# Altium PCB PWM_Controller_Full_Bridge_TL494.PcbDoc (part 1 of 2)
Units mm, origin at the board's own origin, x right, y up, seen from the top; angles counter-clockwise.
Board outline 90 x 70 mm, 2 copper layers (Top Layer, Bottom Layer), stack 1.071 mm thick; 169 components, 72 nets, 398 pads, 71 vias.
Unrouted connection lines stored in the file: 17.
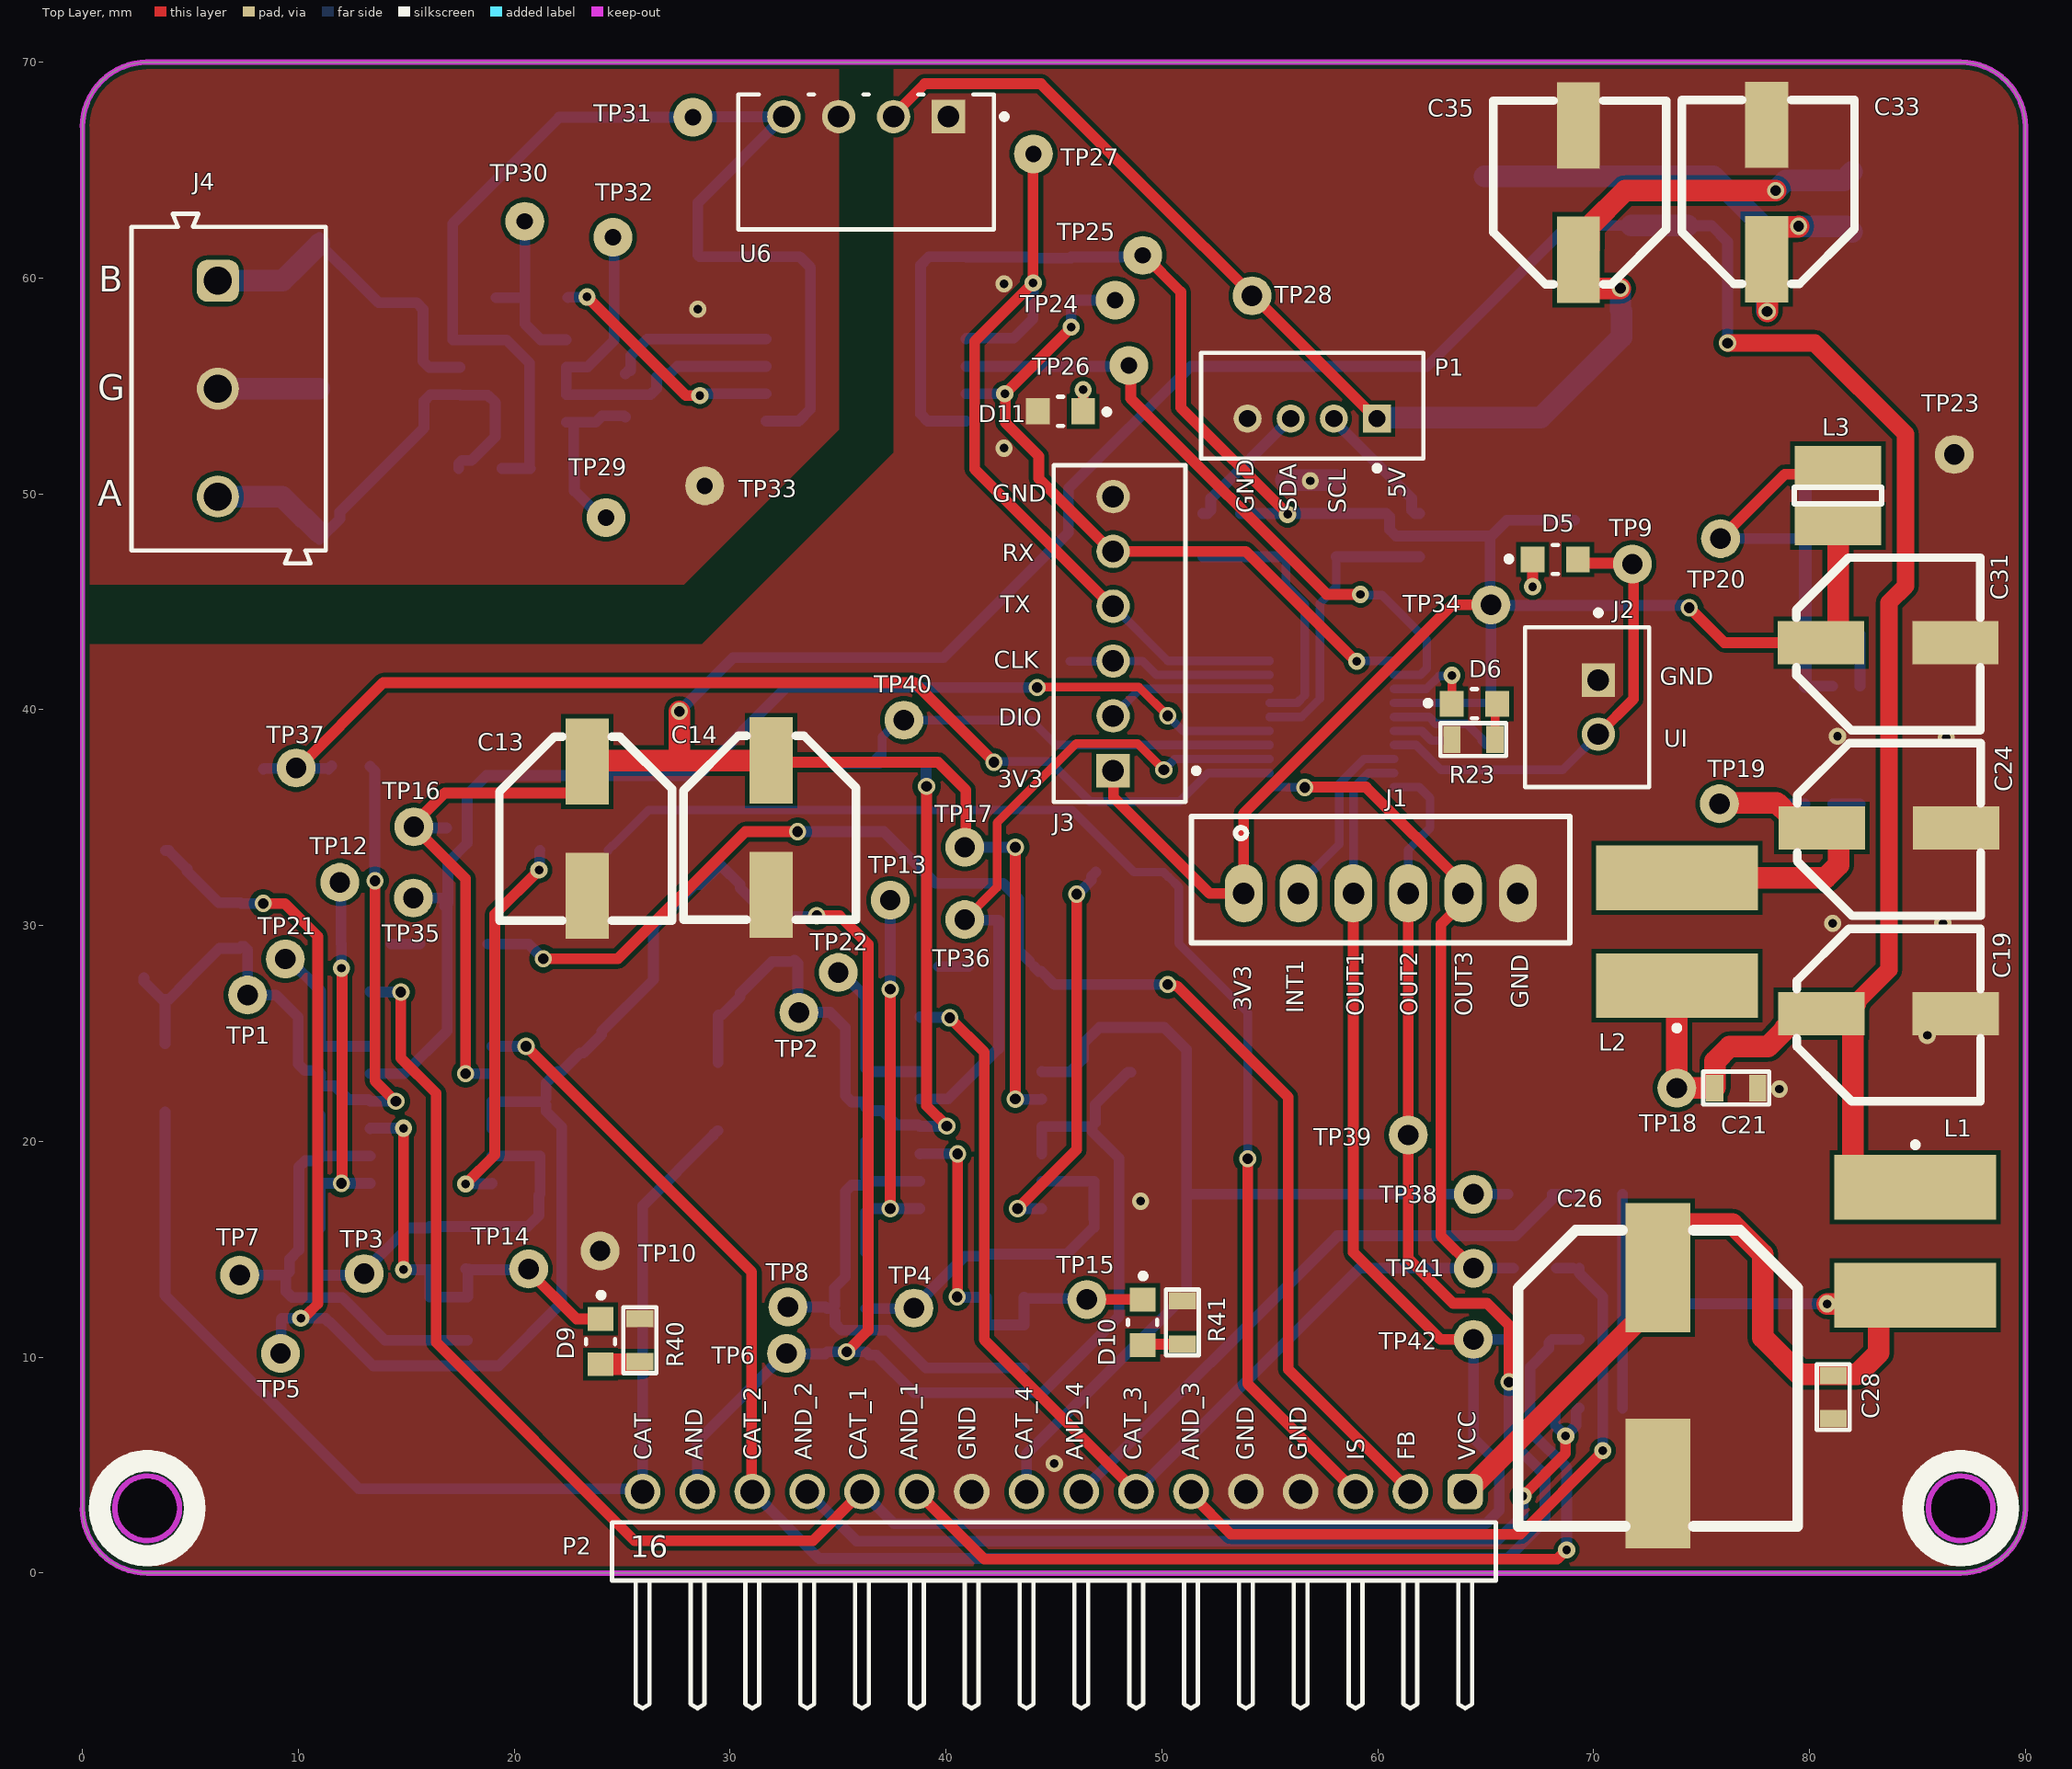
[diagram p0: Top Layer view]
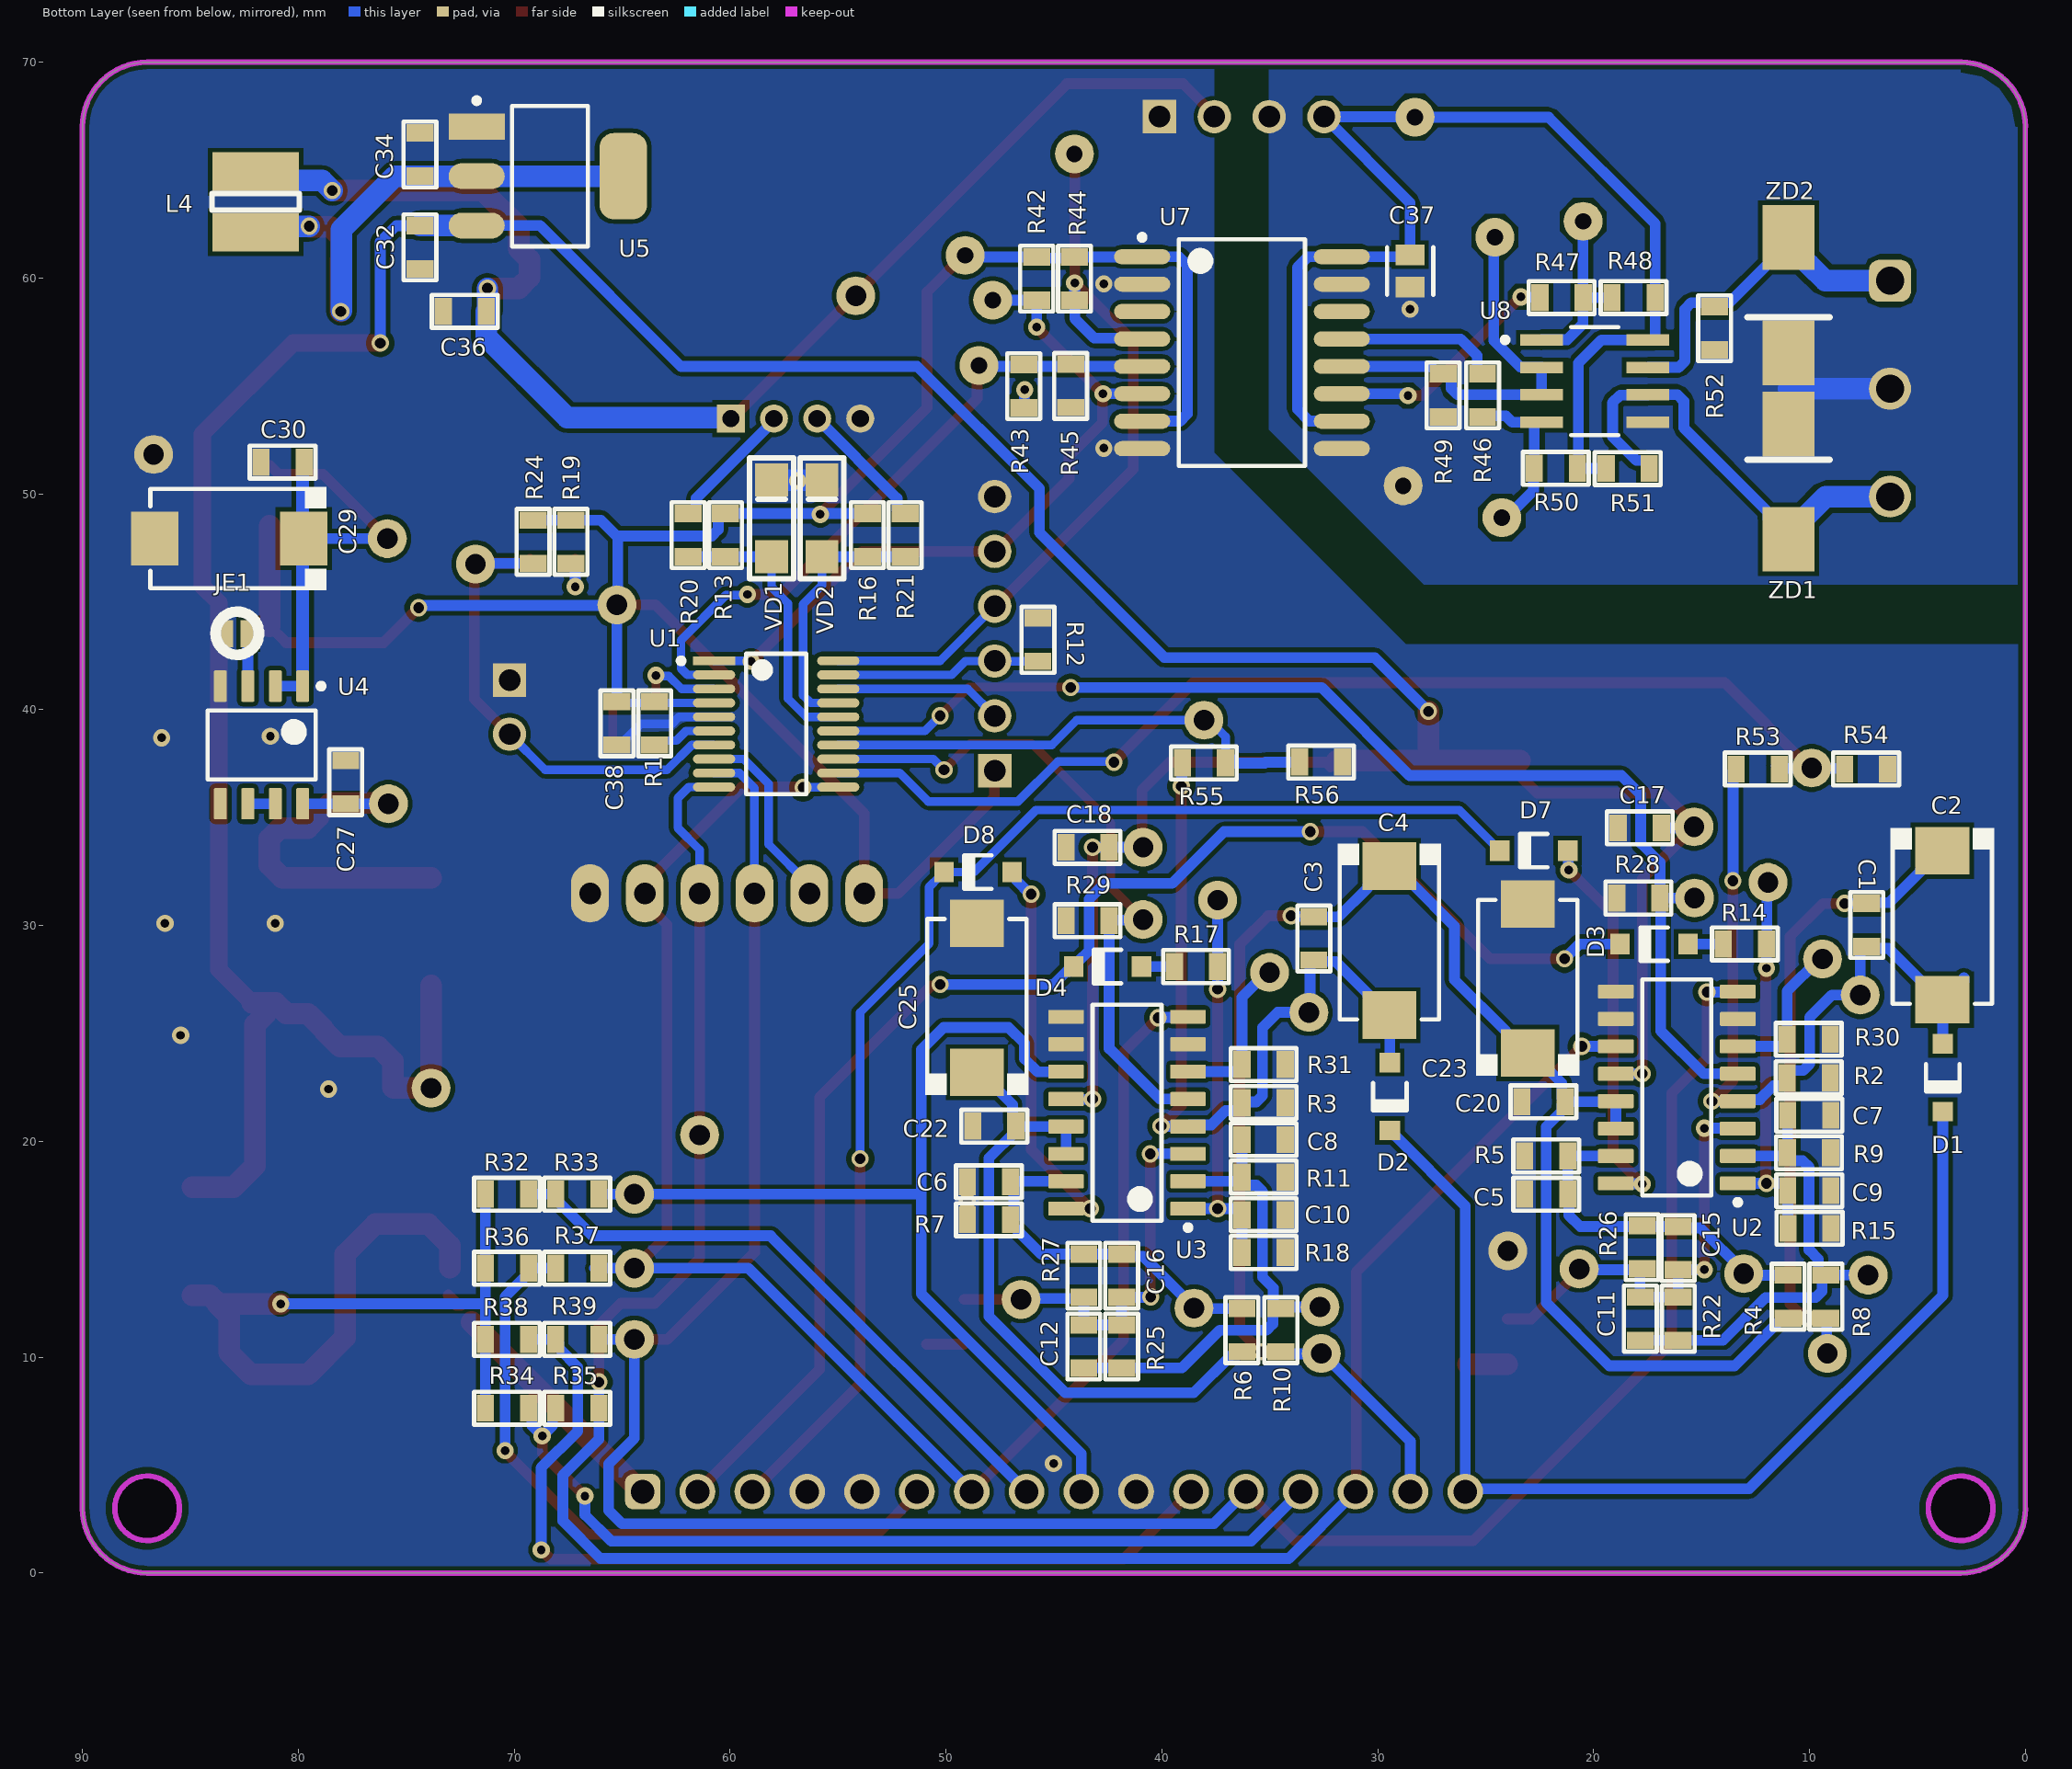
[diagram p1: Bottom Layer view, seen from below]
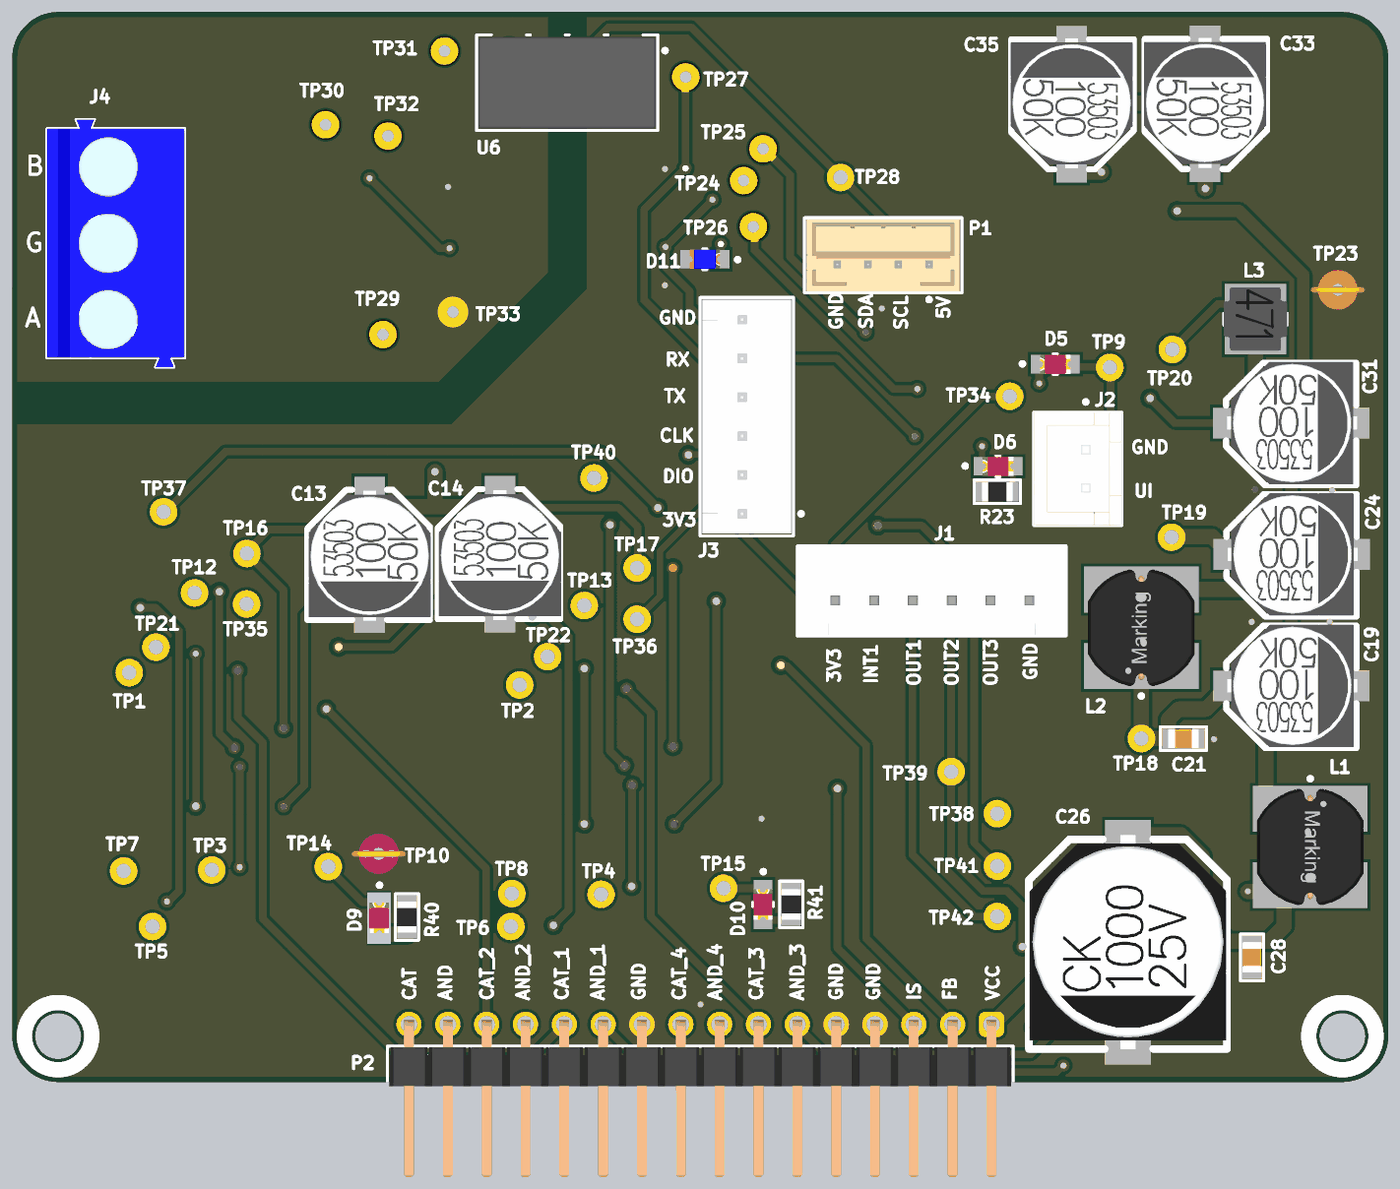
[diagram p2: 3D render of the assembled board from above, using the file's embedded part models]
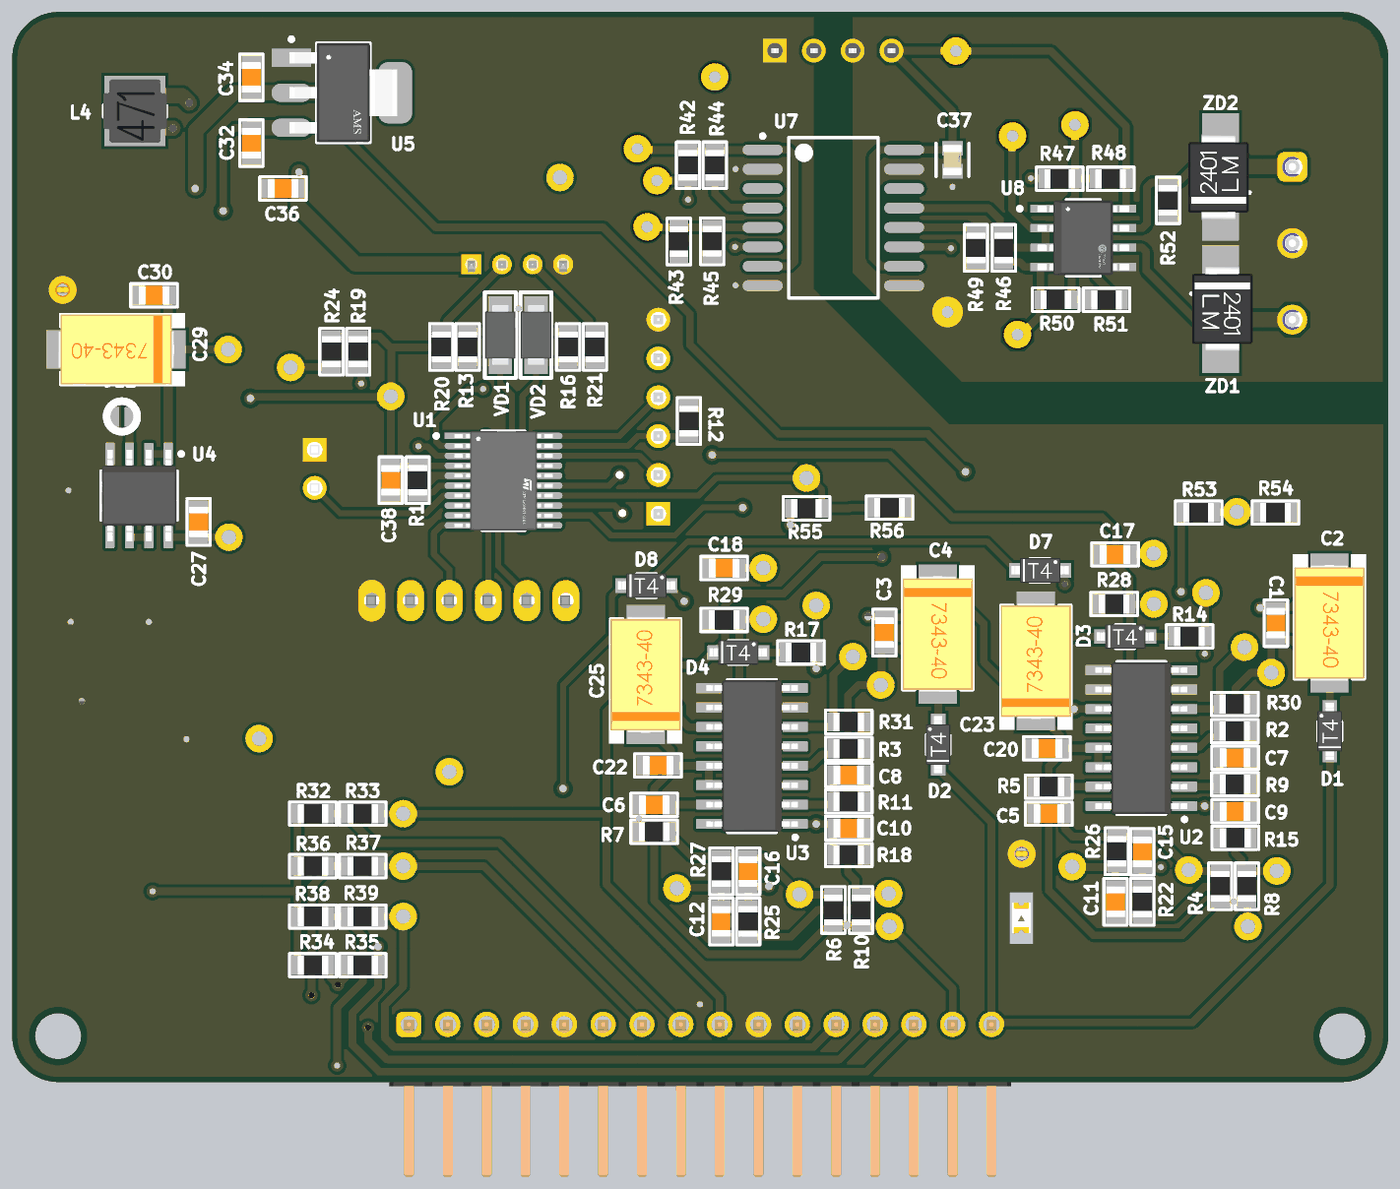
[diagram p3: 3D render of the assembled board from below, using the file's embedded part models]

## Layer stack, top to bottom
Top Solder: solder mask 0.0102, Solder Resist, Dk 3.5
Top Layer: signal copper 0.0356
Dielectric 1: dielectric 1, FR-4, Dk 4.8
Bottom Layer: signal copper 0.0356
Bottom Solder: solder mask 0.0102, Solder Resist, Dk 3.5

## Board outline
0,3 0.006,67 0,67 cw(c3,67) 3,70 87,70 cw(c87,67) 90,67 90,3.05 90,3 cw(c87,3) 87,0 2.999,0 3,0 cw(c3,3)
cut-out: 85.5,3 ccw(c87,3) 87,1.5 ccw(c87,3) 88.5,3 ccw(c87,3) 87,4.5 ccw(c87,3)
cut-out: 1.5,3 ccw(c3,3) 3,1.5 ccw(c3,3) 4.5,3 ccw(c3,3) 3,4.5 ccw(c3,3)

## Design rules (kind name [scope] priority, off if disabled: settings)
Clearance [All] p1: gap=0.2 ignorepadtopadclearanceinfootprint=FALSE except(0.4: Fill-Fill Fill-Poly Fill-Region Fill-Text Fill-Hole Poly-Poly Poly-Region Poly-Text Poly-Hole Region-Region Region-Text Region-Hole)
ComponentClearance [All] p1: gap=-3 collisioncheckmode=3 verticalgap=0.254 showdistances=FALSE
DiffPairsRouting [All] p1: maxlimit=0.254 minlimit=0.254 mostfreqgap=0.254 substack1={A23D90DD-733B-49C5-8102-56B3D284E3A0} toplayer_{a23d90dd-733b-49c5-8102-56b3d284e3a0}_minwidth=0.381 toplayer_{a23d90dd-733b-49c5-8102-56b3d284e3a0}_maxwidth=0.381 toplayer_{a23d90dd-733b-49c5-8102-56b3d284e3a0}_prefwidth=0.381 bottomlayer_{a23d90dd-733b-49c5-8102-56b3d284e3a0}_minwidth=0.381 bottomlayer_{a23d90dd-733b-49c5-8102-56b3d284e3a0}_maxwidth=0.381 bottomlayer_{a23d90dd-733b-49c5-8102-56b3d284e3a0}_prefwidth=0.381 toplayer_minwidth=0.381 toplayer_maxwidth=0.381 toplayer_prefwidth=0.381 bottomlayer_minwidth=0.381 bottomlayer_maxwidth=0.381 bottomlayer_prefwidth=0.381 substack2={0B3DB408-A969-412D-8C07-BA8AE97219D9} toplayer_{0b3db408-a969-412d-8c07-ba8ae97219d9}_minwidth=0.381 toplayer_{0b3db408-a969-412d-8c07-ba8ae97219d9}_maxwidth=0.381 toplayer_{0b3db408-a969-412d-8c07-ba8ae97219d9}_prefwidth=0.381 bottomlayer_{0b3db408-a969-412d-8c07-ba8ae97219d9}_minwidth=0.381 bottomlayer_{0b3db408-a969-412d-8c07-ba8ae97219d9}_maxwidth=0.381 bottomlayer_{0b3db408-a969-412d-8c07-ba8ae97219d9}_prefwidth=0.381 substack3={378827E6-B38F-4565-9D2F-710D8D441C30} toplayer_{378827e6-b38f-4565-9d2f-710d8d441c30}_minwidth=0.381 toplayer_{378827e6-b38f-4565-9d2f-710d8d441c30}_maxwidth=0.381 toplayer_{378827e6-b38f-4565-9d2f-710d8d441c30}_prefwidth=0.381 bottomlayer_{378827e6-b38f-4565-9d2f-710d8d441c30}_minwidth=0.381 bottomlayer_{378827e6-b38f-4565-9d2f-710d8d441c30}_maxwidth=0.381 bottomlayer_{378827e6-b38f-4565-9d2f-710d8d441c30}_prefwidth=0.381 substack4={1E65D4A7-266F-4925-B814-5E9C4A66F8EE} toplayer_{1e65d4a7-266f-4925-b814-5e9c4a66f8ee}_minwidth=0.381 toplayer_{1e65d4a7-266f-4925-b814-5e9c4a66f8ee}_maxwidth=0.381 toplayer_{1e65d4a7-266f-4925-b814-5e9c4a66f8ee}_prefwidth=0.381 bottomlayer_{1e65d4a7-266f-4925-b814-5e9c4a66f8ee}_minwidth=0.381 bottomlayer_{1e65d4a7-266f-4925-b814-5e9c4a66f8ee}_maxwidth=0.381 bottomlayer_{1e65d4a7-266f-4925-b814-5e9c4a66f8ee}_prefwidth=0.381 substack5={93C5D03E-862D-45F8-9871-970EEA9B3F11} toplayer_{93c5d03e-862d-45f8-9871-970eea9b3f11}_minwidth=0.381 toplayer_{93c5d03e-862d-45f8-9871-970eea9b3f11}_maxwidth=0.381 toplayer_{93c5d03e-862d-45f8-9871-970eea9b3f11}_prefwidth=0.381 bottomlayer_{93c5d03e-862d-45f8-9871-970eea9b3f11}_minwidth=0.381 bottomlayer_{93c5d03e-862d-45f8-9871-970eea9b3f11}_maxwidth=0.381 bottomlayer_{93c5d03e-862d-45f8-9871-970eea9b3f11}_prefwidth=0.381 maxuncoupledlength=12.7
Height [All] p1: minheight=0 maxheight=50 prefheight=33
HoleSize [All] p1: absolutevalues=TRUE maxlimit=6 minlimit=0.01 maxpercent=80.000 minpercent=20.000
HoleToHoleClearance [All] p1: gap=0.1 allowstackedmicrovias=TRUE
MinimumSolderMaskSliver [All] p1: minsoldermaskwidth=0.1
PlaneClearance [All] p1: clearance=0.7
PlaneConnect [All] p1: planeconnectstyle=Direct reliefexpansion=0.5 reliefentries=4 reliefconductorwidth=0.5 reliefairgap=0.15
PolygonConnect VQFN20 [HasFootprint('VQFN20')] p1: connectstyle=Direct reliefconductorwidth=0.254 reliefentries=4 polygonreliefangle="90 Angle" airgapwidth=0.254
PolygonConnect [All] p2: connectstyle=Direct reliefconductorwidth=0.3 reliefentries=4 polygonreliefangle="90 Angle" airgapwidth=0.15
RoutingVias [All] p1: holewidth=0.1 width=0.1 viastyle="Through Hole" minholewidth=0 minwidth=0.3 maxholewidth=2 maxwidth=4
ShortCircuit [All] p1: allowed=TRUE
SilkToSolderMaskClearance [IsPad] p1: minsilkscreentomaskgap=0.1 clearancetoexposedcopper=TRUE
SolderMaskExpansion SolderMaskExpansion_Via [IsVia] p1: expansion=0.102 istentingtop=TRUE useseparateexpansions=TRUE expansionbottom=0.102 istentingbottom=TRUE
SolderMaskExpansion [All] p2: expansion=0.01 istentingtop=FALSE
SupplyNets "Schematic Supply Nets_5" [InNet('GND_2')] p1: voltage=0.000
SupplyNets "Schematic Supply Nets_4" [InNet('+5V')] p2: voltage=0.000
SupplyNets "Schematic Supply Nets_3" [InNet('+12')] p3: voltage=0.000
SupplyNets "Schematic Supply Nets_2" [InNet('+5V_ISO')] p4: voltage=0.000
SupplyNets "Schematic Supply Nets_1" [InNet('GND')] p5: voltage=0.000
SupplyNets "Schematic Supply Nets" [InNet('+3v3')] p6: voltage=0.000
UnRoutedNet [All] p1: checkbadconnections=TRUE
Width [All] p1: maxlimit=5 minlimit=0.2 preferedwidth=0.3 substack1={A23D90DD-733B-49C5-8102-56B3D284E3A0} substack2={0B3DB408-A969-412D-8C07-BA8AE97219D9} substack3={378827E6-B38F-4565-9D2F-710D8D441C30} substack4={1E65D4A7-266F-4925-B814-5E9C4A66F8EE} substack5={93C5D03E-862D-45F8-9871-970EEA9B3F11}
19 further rules are at their usual default settings.

## Components (designator, comment, footprint, x,y, rotation, side; value= is the part's Value field where it differs from the comment)
C1 "CAP-NON-POLAR" CAP-0805 7.35,30.022 r90 bottom
C2 "CAP-POLAR" CAP-TAN-D 3.85,30.022 r270 bottom
C3 "CAP-NON-POLAR" CAP-0805 32.965,29.4 r90 bottom
C4 "CAP-POLAR" CAP-TAN-D 29.465,29.3 r270 bottom
C5 "CAP-NON-POLAR" CAP-0805 22.2,17.553 r180 bottom
C6 "CAP-NON-POLAR" CAP-0805 48.015,18.128 r180 bottom
C7 "CAP-NON-POLAR" CAP-0805 10.013,21.21 r0 bottom
C8 "CAP-NON-POLAR" CAP-0805 35.29,20.08 r0 bottom
C9 "CAP-NON-POLAR" CAP-0805 10.013,17.716 r0 bottom
C10 "CAP-NON-POLAR" CAP-0805 35.29,16.604 r0 bottom
C11 "2.2nF 16V" CAP-0805 17.837,11.787 r270 bottom
C12 "2.2nF 16V" CAP-0805 43.615,10.5 r270 bottom
C13 "CAP-POLAR" CAP_SMD_Size_E 23.375,34.425 r90 top
C14 "CAP-POLAR" CAP_SMD_Size_E 31.9,34.47 r90 top
C15 "2.2nF 16V" CAP-0805 16.09,15.055 r90 bottom
C16 "2.2nF 16V" CAP-0805 41.865,13.775 r90 bottom
C17 "0.1uF" CAP-0805 17.867,34.522 r180 bottom
C18 "0.1uF" CAP-0805 43.44,33.625 r180 bottom
C19 "CAP-POLAR" CAP_SMD_Size_E 83.727,25.916 r180 top
C20 "0.1uF" CAP-0805 22.325,21.835 r180 bottom
C21 "0.1uF" CAP-0805 76.602,22.466 r180 top
C22 "0.1uF" CAP-0805 47.763,20.705 r180 bottom
C23 "CAP-POLAR" CAP-TAN-D 23.05,27.542 r90 bottom
C24 "CAP-POLAR" CAP_SMD_Size_E 83.741,34.516 r180 top
C25 "CAP-POLAR" CAP-TAN-D 48.565,26.65 r90 bottom
C26 "25V_1000uF" CAP_SMD_SIZE_H 72.975,9.15 r90 top
C27 "0.1uF" CAP-0805 77.802,36.641 r270 bottom
C28 "0.1uF" CAP-0805 81.1,8.15 r90 top
C29 "CAP-POLAR" CAP-TAN-D 83.202,47.926 r0 bottom
C30 "0.1uF" CAP-0805 80.727,51.466 r180 bottom
C31 "CAP-POLAR" CAP_SMD_Size_E 83.71,43.109 r180 top
C32 "0.1uF" CAP-0805 74.366,61.425 r90 bottom
C33 "CAP-POLAR" CAP_SMD_Size_E 78.016,64.05 r270 top
C34 "0.1uF" CAP-0805 74.366,65.725 r270 bottom
C35 "CAP-POLAR" CAP_SMD_Size_E 69.291,64.025 r270 top
C36 "0.1uF" CAP-0805 72.291,58.455 r180 bottom
C37 "C0805C224K5RACTU" FP-C0805C-DN-MFG 28.5,60.325 r270 bottom value="0.22 μF"
C38 "0.1uF" CAP-0805 65.242,39.369 r90 bottom
D1 "1N4148" DIOD-SOD123-2_V 3.825,22.947 r270 bottom
D2 "1N4148" DIOD-SOD123-2_V 29.44,22.075 r270 bottom
D3 "1N4148" DIOD-SOD123-2_V 17.202,29.139 r0 bottom
D4 "1N4148" DIOD-SOD123-2_V 42.515,28.1 r0 bottom
D5 "151031YS06000" LED_RED 68.224,46.957 r0 top
D6 "151031YS06000" LED_RED 64.48,40.278 r0 top
D7 "1N4148" DIOD-SOD123-2_V 22.775,33.472 r0 bottom
D8 "1N4148" DIOD-SOD123-2_V 48.515,32.475 r0 bottom
D9 "RED" LED_RED 24,10.725 r270 top
D10 "RED" LED_RED 49.104,11.614 r270 top
D11 "LED" LED_BLUE 45.3,53.825 r180 top
J1 "B6B-XH-TW" B6B-XH-TW 60.14,32.124 r0 top
J2 "B2B-XH-A" B2B-XH-A 69.692,40.116 r270 top
J3 "SWR25X-NRTC-S06-ST-BA" Sullins_SWR25X-NRTC-S06-ST-BA_MFG 48.042,43.524 r90 top
J4 "" 691101710003 6.775,54.875 r270 top
JE1 "Jumper" JE 82.827,43.541 r270 bottom
L1 "47µH, 1.17A" WE-PD2_7850 84.9,15.375 r270 top
L2 "1000µH, 0.3A" WE-PD2_7850 73.852,29.716 r90 top
L3 "Coil" Coil_4.5x4.5_mm 81.316,49.916 r270 top
L4 "Coil" Coil_4.5x4.5_mm 81.975,63.525 r90 bottom
P1 "62000411622" 62000411622 56.967,54.089 r0 top
P2 "61301611021" 61301611021 45,1 r0 top locked
R1 "10K" RES-0805 63.492,39.369 r270 bottom
R2 "10K" RES-0805 10.036,22.947 r180 bottom
R3 "10K" RES-0805 35.29,21.8 r180 bottom
R4 "2K**" RES-0805 10.993,12.805 r90 bottom
R5 "2K" RES-0805 22.2,19.323 r0 bottom
R6 "2K**" RES-0805 36.29,11.25 r90 bottom
R7 "2K" RES-0805 48.015,16.372 r0 bottom
R8 "10K**" RES-0805 9.243,12.805 r90 bottom
R9 "2K" RES-0805 10.025,19.472 r180 bottom
R10 "10K**" RES-0805 34.49,11.25 r90 bottom
R11 "2K" RES-0805 35.29,18.35 r180 bottom
R12 "10K" RES-0805 45.742,43.239 r90 bottom
R13 "10K" RES-0805 60.213,48.089 r90 bottom
R14 "2K" RES-0805 13,29.148 r180 bottom
R15 "2K" RES-0805 10,15.972 r180 bottom
R16 "10K" RES-0805 53.642,48.089 r90 bottom
R17 "2K" RES-0805 38.415,28.1 r180 bottom
R18 "2K" RES-0805 35.29,14.85 r180 bottom
R19 "220" RES-0805 67.374,47.782 r90 bottom
R20 "10E" RES-0805 61.942,48.089 r90 bottom
R21 "10E" RES-0805 51.892,48.089 r90 bottom
R22 "1M" RES-0805 16.084,11.787 r90 bottom
R23 "220" RES-0805 64.43,38.614 r180 top
R24 "10K" RES-0805 69.124,47.782 r270 bottom
R25 "1M" RES-0805 41.865,10.5 r90 bottom
R26 "1M" RES-0805 17.75,15.097 r270 bottom
R27 "1M" RES-0805 43.615,13.775 r270 bottom
R28 "10K" RES-0805 17.928,31.272 r0 bottom
R29 "10K" RES-0805 43.44,30.225 r0 bottom
R30 "10K" RES-0805 10.036,24.727 r180 bottom
R31 "10K" RES-0805 35.29,23.555 r180 bottom
R32 "3K" RES-0805 70.335,17.551 r0 bottom
R33 "1K" RES-0805 67.08,17.551 r0 bottom
R34 "3K" RES-0805 70.335,7.64 r0 bottom
R35 "1K" RES-0805 67.08,7.64 r0 bottom
R36 "3K" RES-0805 70.335,14.121 r0 bottom
R37 "1K" RES-0805 67.08,14.121 r0 bottom
R38 "3K" RES-0805 70.335,10.826 r0 bottom
R39 "1K" RES-0805 67.08,10.826 r0 bottom
R40 "330" RES-0805 25.82,10.788 r270 top
R41 "330" RES-0805 50.95,11.614 r270 top
R42 "10K" RES-0805 45.8,59.975 r90 bottom
R43 "220" RES-0805 46.4,54.986 r90 bottom
R44 "10K" RES-0805 44.05,59.975 r90 bottom
R45 "10K" RES-0805 44.225,55 r90 bottom
R46 "100" RES-0805 25.148,54.564 r90 bottom
R47 "100" RES-0805 21.49,59.093 r0 bottom
R48 "10K" RES-0805 18.15,59.093 r180 bottom
R49 "10K" RES-0805 26.975,54.564 r90 bottom
R50 "10K" RES-0805 21.75,51.181 r180 bottom
R51 "10K" RES-0805 18.425,51.175 r0 bottom
R52 "10K" RES-0805 14.4,57.675 r90 bottom
R53 "4.7K" RES-0805 12.4,37.25 r0 bottom
R54 "1K" RES-0805 7.379,37.25 r0 bottom
R55 "4.7K" RES-0805 38.051,37.528 r0 bottom
R56 "1K" RES-0805 32.622,37.57 r0 bottom
TP1 "" Test_Point#1 7.65,26.781 r90 top
TP2 "" Test_Point#1 33.19,25.975 r90 top
TP3 "" Test_Point#1 13.05,13.871 r90 top
TP4 "" Test_Point#1 38.515,12.275 r90 top
TP5 "" Test_Point#1 9.175,10.172 r90 top
TP6 "" Test_Point#1 32.615,10.172 r90 top
TP7 "" Test_Point#1 7.286,13.805 r90 top
TP8 "" Test_Point#1 32.677,12.325 r90 top
TP9 "Test_Point_PCB" Test_Point#1 71.792,46.748 r0 top
TP10 "Test_Point_PCB" Pin_Test_Point(Pink) 23.975,14.925 r90 top
TP12 "" Test_Point#1 11.925,32 r90 top
TP13 "" Test_Point#1 37.415,31.175 r180 top
TP14 "" Test_Point#1 20.67,14.088 r90 top
TP15 "" Test_Point#1 46.525,12.674 r180 top
TP16 "" Test_Point#1 15.349,34.575 r90 top
TP17 "" Test_Point#1 40.872,33.625 r180 top
TP18 "Test_Point_PCB" Test_Point#1 73.852,22.466 r180 top
TP19 "Test_Point_PCB" Test_Point#1 75.827,35.641 r180 top
TP20 "Test_Point_PCB" Test_Point#1 75.877,47.926 r180 top
TP21 "" Test_Point#1 9.4,28.447 r90 top
TP22 "" Test_Point#1 35.015,27.825 r180 top
TP23 "Test_Point_PCB" Pin_Test_Point(Orange) 86.7,51.825 r90 top
TP24 "Test_Point_PCB" Test_Point#2 47.839,58.975 r90 top
TP25 "" Test_Point#2 49.111,61.05 r90 top
TP26 "Test_Point_PCB" Test_Point#2 48.475,55.95 r90 top
TP27 "Test_Point_PCB" Test_Point#2 44.05,65.75 r90 top
TP28 "Test_Point_PCB" Test_Point#1 54.175,59.175 r90 top
TP29 "Test_Point_PCB" Test_Point#2 24.25,48.9 r90 top
TP30 "" Test_Point#2 20.49,62.625 r90 top
TP31 "Test_Point_PCB" Test_Point#2 28.275,67.45 r90 top
TP32 "Test_Point_PCB" Test_Point#2 24.575,61.886 r90 top
TP33 "Test_Point_PCB" Test_Point#2 28.825,50.375 r90 top
TP34 "" Test_Point#1 65.242,44.857 r90 top
TP35 "Test_Point_PCB" Test_Point#1 15.328,31.272 r180 top
TP36 "Test_Point_PCB" Test_Point#1 40.872,30.275 r180 top
TP37 "Test_Point_PCB" Test_Point#1 9.9,37.3 r0 top
TP38 "Test_Point_PCB" Test_Point#3 64.58,17.551 r0 top
TP39 "Test_Point_PCB" Test_Point#4 61.56,19.996 r0 top
TP40 "Test_Point_PCB" Test_Point#1 38.051,39.516 r0 top
TP41 "Test_Point_PCB" Test_Point#3 64.58,14.121 r0 top
TP42 "Test_Point_PCB" Test_Point#3 64.58,10.826 r0 top
U1 "STM32G030F6P6" FP-TSSOP20-YA-IPC_A 57.867,39.339 r180 bottom
U2 "TL494" SOIC-16-M 16.15,22.497 r0 bottom
U3 "TL494" SOIC-16-M 41.615,21.325 r0 bottom
U4 "LP2951ACM-3.3" D0008A_N 81.702,38.366 r270 bottom
U5 "AMS1117" SOT-223 68.345,64.719 r270 bottom
U6 "B0505S-1W" B0505S-1W 36.3,65.375 r180 top
U7 "ADUM1401BRWZ" ADI-RW-16_M 36.292,56.541 r180 bottom
U8 "MAX485" SOIC-8-MFG 19.95,55.225 r180 bottom
VD1 "SMF3.3A" SMF3.3A 58.079,48.864 r180 bottom
VD2 "SMF3.3A" SMF3.3A 55.742,48.864 r180 bottom
ZD1 "P6SMB16CA" DO-214AA 10.975,52.85 r270 bottom
ZD2 "P6SMB16CA" DO-214AA 10.975,56.922 r90 bottom

## Footprints (in the part's own frame and the unit in brackets; to place one, negate y for a bottom-side part, rotate by r counter-clockwise, add the part's x,y. Pads: shape width x height; smd on the part's side, far side on the other; paste and mask are expansions set on the pad)
61301611021 [mm] "Pin Header, pitch 2.54 mm, THT, Angled, single row, 16p"
  rrect50% 1.65x1.65 hole 1.1: 1(19.05,2.77)
  round 1.65 hole 1.1: 2(16.51,2.77) 3(13.97,2.77) 4(11.43,2.77) 5(8.89,2.77) 6(6.35,2.77) 7(3.81,2.77) 8(1.27,2.77) 9(-1.27,2.77) 10(-3.81,2.77) 11(-6.35,2.77) 12(-8.89,2.77) 13(-11.43,2.77) 14(-13.97,2.77) 15(-16.51,2.77) 16(-19.05,2.77)
  silkscreen extent -20.47,-7.27 20.47,1.35, body extent -20.32,-7.27 20.32,3.09, height 2.58
62000411622 [mm] "2.00mm Male Vertical Shrouded Header, 4p"
  rect 1.3x1.3 hole 0.8: 1(3,-0.6)
  round 1.3 hole 0.8: 2(1,-0.6) 3(-1,-0.6) 4(-3,-0.6)
  silkscreen extent -5.15,-3.02 5.15,2.45, body extent -5,-2.35 5,2.35, height 6.13
691101710003 [mm] "5,00mm - modular - blue - Horizontal entry with pressure clamp - 12,6mm height - 03p"
  rrect50% 1.95x1.95 hole 1.3: 1(-5,-0.5)
  round 1.95 hole 1.3: 2(0,-0.5) 3(5,-0.5)
  silkscreen extent -8.1,-4.5 8.1,4.5, body extent -8.1,-4.5 8.1,4.5, height 12.65
ADI-RW-16_M [mm] "SOIC, 16-Leads, Body 10.3x7.5mm, Pitch 1.27mm, IPC Low Density"
  oval 2.6x0.7 smd: 1(-4.625,4.445) 2(-4.625,3.175) 3(-4.625,1.905) 4(-4.625,0.635) 5(-4.625,-0.635) 6(-4.625,-1.905) 7(-4.625,-3.175) 8(-4.625,-4.445) 9(4.625,-4.445) 10(4.625,-3.175) 11(4.625,-1.905) 12(4.625,-0.635) 13(4.625,0.635) 14(4.625,1.905) 15(4.625,3.175) 16(4.625,4.445)
  silkscreen extent -4.75,-5.25 2.93,5.47, body extent -3.8,-5.25 3.8,5.25, height 2.65
B2B-XH-A [mm]
  rect 1.55x1.55 hole 1 paste-2539.97 mask+0: 1(-1.25,0.525)
  round 1.55 hole 1 paste-2539.97 mask+0: 2(1.25,0.525)
  silkscreen extent -4.5,-2.88 3.7,2.88, body extent -3.8,-2.98 3.8,2.98, height 0.25
B6B-XH-TW [mm]
  oval 1.75x2.7 hole 1: 1(-6.35,-0.635) 2(-3.81,-0.635) 3(-1.27,-0.635) 4(1.27,-0.635) 5(3.81,-0.635) 6(6.35,-0.635)
  silkscreen extent -8.76,-2.92 8.76,2.92, body extent -8.75,-2.88 8.75,2.88, height 6.88
B0505S-1W [mm]
  rect 1.55x1.55 hole 1 paste-2539.97 mask+0: 1(-3.81,-2.1)
  round 1.55 hole 1 paste-2539.97 mask+0: 2(-1.27,-2.1) 3(1.27,-2.1) 4(3.81,-2.1)
  silkscreen extent -6.53,-3.13 5.92,3.13, body extent -6.02,-3.22 6.02,3.22, height 0.25
CAP-0805 [mm]
  rect 0.8x1.25 smd mask+0.015: 1(-1,0) 2(1,0)
  silkscreen extent -1.52,-0.76 1.52,0.76, body extent -1,-0.62 1,0.63, height 0.8
CAP-TAN-D [mm]
  rect 2.2x2.5 smd: 1(-3.45,0) 2(3.45,0)
  silkscreen extent -4.5,-2.4 3.65,2.4, body extent -3.8,-2.3 3.8,2.3, height 4
CAP_SMD_Size_E [mm]
  rect 4x2 smd: 1(3.175,0) 2(-3.048,0)
  silkscreen extent -4.19,-3.94 4.32,4.06, body extent -4.25,-4 4.25,4, height 10.59
CAP_SMD_SIZE_H [mm]
  rect 6x3 smd: 1(5,0) 2(-5,0)
  silkscreen extent -6.98,-6.48 6.73,6.48, body extent -7,-6.44 7,6.44, height 13.62
Coil_4.5x4.5_mm [mm]
  rect 1.8x4 smd: 1(-1.397,0) 2(1.397,0)
  silkscreen extent -0.38,-2.03 0.38,2.03, body extent -2.07,-2.07 2.07,2.07, height 2.8
D0008A_N [mm] "SOIC, 8-Leads, Body 5x4mm, Pitch 1.27mm, IPC Medium Density"
  rrect17% 1.45x0.6 smd: 1(-2.725,1.905) 2(-2.725,0.635) 3(-2.725,-0.635) 4(-2.725,-1.905) 5(2.725,-1.905) 6(2.725,-0.635) 7(2.725,0.635) 8(2.725,1.905)
  silkscreen extent -2.85,-2.5 1.6,2.88, body extent -3,-2.45 3,2.45, height 1.63
DIOD-SOD123-2_V [mm] "SOD123, 2-Leads, Body 2.7x1.55mm, Height 1.45mm"
  rect 0.9x0.95 smd: 1(1.575,0) 2(-1.575,0)
  silkscreen extent -0.64,-0.83 0.64,0.77, body extent -1.88,-0.8 1.88,0.8, height 1.3
DO-214AA [mm]
  rect 3x2.4 smd: 1(-0.381,0) 2(4.953,0)
  silkscreen extent 1.27,-1.91 1.27,1.9, body extent -0.53,-1.85 5.07,2.1, height 2.65
FP-C0805C-DN-MFG [mm]
  rect 0.95x1.35 smd paste+0 mask+0: 1(-0.75,0) 2(0.75,0)
  silkscreen extent -1.1,-1.07 1.1,1.07, body extent -1,-0.63 1,0.63, height 0.88
FP-TSSOP20-YA-IPC_A [mm]
  rect 1.955x0.421 smd paste+0 mask+0: 1(-2.875,2.925)
  rrect100% 1.955x0.421 smd paste+0 mask+0: 2(-2.875,2.275) 3(-2.875,1.625) 4(-2.875,0.975) 5(-2.875,0.325) 6(-2.875,-0.325) 7(-2.875,-0.975) 8(-2.875,-1.625) 9(-2.875,-2.275) 10(-2.875,-2.925) 11(2.875,-2.925) 12(2.875,-2.275) 13(2.875,-1.625) 14(2.875,-0.975) 15(2.875,-0.325) 16(2.875,0.325) 17(2.875,0.975) 18(2.875,1.625) 19(2.875,2.275) 20(2.875,2.925)
  silkscreen extent -4.53,-3.25 1.4,3.25, body extent -3.21,-3.25 3.21,3.25, height 1.2
JE [mil]
  rect 50x27.56 smd: 1(1,20) 2(1,-21)
  silkscreen extent -39,-39 39,39
LED_BLUE [mm]
  rect 1.1x1.2 smd paste+0 mask+0: 1(-1.05,0) 2(1.05,0)
  silkscreen extent -2.28,-0.67 0.13,0.67, body extent -1,-0.63 1,0.63, height 0.8
LED_RED [mm]
  rect 1.1x1.2 smd paste+0 mask+0: 1(-1.05,0) 2(1.05,0)
  silkscreen extent -2.27,-0.67 0.13,0.67, body extent -1.7,-0.77 1.7,0.77, height 0.25
Pin_Test_Point(Orange) [mm]
  round 1.8 hole 0.95: 1(0,0)
  body extent -1.3,-1.78 1.3,1.78, height 6.93
Pin_Test_Point(Pink) [mm]
  round 1.8 hole 0.95: 1(0,0)
  body extent -1.3,-1.78 1.3,1.78, height 6.93
RES-0805 [mm]
  rect 0.8x1.25 smd mask+0.015: 1(-1,0) 2(1,0)
  silkscreen extent -1.52,-0.76 1.52,0.76, body extent -1,-0.62 1,0.63, height 0.6
SMF3.3A [mil]
  rect 60x60 smd: 1(0,70) 2(0,-70)
  silkscreen extent -40,-110 40,110, body extent -39,-77 39,77, height 48
SOIC-8-MFG [mm]
  rect 1.98x0.53 smd paste+0 mask+0: 1(-2.465,1.905) 2(-2.465,0.635) 3(-2.465,-0.635) 4(-2.465,-1.905) 5(2.465,-1.905) 6(2.465,-0.635) 7(2.465,0.635) 8(2.465,1.905)
  silkscreen extent -4.28,-2.5 1.1,2.5, body extent -3,-2.45 3,2.45, height 1.75
SOIC-16-M [mm]
  rrect15% 1.65x0.65 smd: 1(-2.825,4.445) 2(-2.825,3.175) 3(-2.825,1.905) 4(-2.825,0.635) 5(-2.825,-0.635) 6(-2.825,-1.905) 7(-2.825,-3.175) 8(-2.825,-4.445) 9(2.825,-4.445) 10(2.825,-3.175) 11(2.825,-1.905) 12(2.825,-0.635) 13(2.825,0.635) 14(2.825,1.905) 15(2.825,3.175) 16(2.825,4.445)
  silkscreen extent -2.95,-5 1.6,5.44, body extent -3,-4.95 3,4.95, height 1.59
SOT-223 [mm]
  rect 1.2x2.6 smd paste+0 mask+0: 1(-2.29,-3.395)
  rrect100% 1.2x2.6 smd paste+0 mask+0: 2(0,-3.395) 3(2.29,-3.395)
  rrect59% 4x2.2 smd paste+0 mask+0: 2(0,3.395)
  silkscreen extent -3.62,-3.52 3.25,1.75, body extent -3.25,-3.53 3.25,3.53, height 1.8
Sullins_SWR25X-NRTC-S06-ST-BA_MFG [mm]
  rect 1.55x1.55 hole 1 paste-2539.97 mask+0: 1(-6.35,0.3)
  round 1.55 hole 1 paste-2539.97 mask+0: 2(-3.81,0.3) 3(-1.27,0.3) 4(1.27,0.3) 5(3.81,0.3) 6(6.35,0.3)
  silkscreen extent -7.8,-3.68 7.8,3.05, body extent -7.9,-3.15 7.9,3.15, height 0.25
Test_Point#1 [mm]
  round 1.8 hole 0.95: 1(0,0)
Test_Point#2 [mm]
  round 1.8 / inner round 2.286 / far side round 1.8 hole 0.762 paste-2539.97 mask+0.102: 1(0,0)
Test_Point#3 [mm]
  round 1.8 hole 0.95: 1(-0.15,0)
Test_Point#4 [mm]
  round 1.8 hole 0.95: 1(-0.15,0.3)
WE-PD2_7850 [mm] "SMD Power Inductor, 2-Leads, body 7.8x7mm"
  rect 3x7.5 smd: 1(-2.5,0) 2(2.5,0)
  silkscreen extent -4.59,-0.12 -4.34,0.13, body extent -3.81,-3.5 3.81,3.5, height 4.95

## Part data
C11 C12 C15 C16 C17 C18 C20 C21 C22 C27 C28 C30 C32 C34 C36 C38: library part CAP-NON-POLAR
C26: library part CAP_POL_SMD
C37: library part CMP-1036-04552-2, "CAP CER 0.22UF 50V X7R 0805", Capacitance="0.22 μF", Manufacturer=KEMET, Package=C0805C-DN, Temperature="-55°C to +125°C", Temperature Characteristic=X7R, Temperature Coefficient=30ppm/°C, Temperature Range High=+125°C, Temperature Range Low=-55°C, Tolerance=0.1, Voltage Rating="50 V", Automotive=No, Category=Cap, ComponentLink2Description=Datasheet, ComponentLink2URL=https://content.kemet.com/datasheets/KEM_C1003_C0G_SMD.pdf, Device Class L1="Passive Components", Device Class L2=Capacitors, Device Class L3="Ceramic Capacitors", Digikey Description="CAP CER 0.22UF 50V X7R 0805", Height=0.88mm, Ipc Land Pattern Name=CAPC200125X78, Lead Free=Yes, Manufacturer Part Number=C0805C224K5RACTU, Material=Ceramic, Mouser Description="CAP CER 0.22UF 50V X7R 0805", Octopart=https://octopart.com/c0805c224k5ractu-kemet-144670, RoHS=TRUE
D5 D6: library part LED, "WURTH ELEKTRONIK - 151031YS06000 - LED, Yellow, Through Hole, T-1 (3mm), 30 mA, 2 V, 590 nm", Manufacturer_Name="Wurth Elektronik", Mouser Part Number=710-151031YS06000, Datasheet Link=https://katalog.we-online.de/led/datasheet/151031YS06000.pdf, Geometry.Height=5.5mm, Manufacturer_Part_Number=151031YS06000, Mouser Price/Stock=https://www.mouser.co.uk/ProductDetail/Wurth-Elektronik/151031YS06000?qs=LlUlMxKIyB3xSYYW%252BcuBiQ%3D%3D
D9 D10: library part LED, "WURTH ELEKTRONIK - 151031YS06000 - LED, Yellow, Through Hole, T-1 (3mm), 30 mA, 2 V, 590 nm", Manufacturer_Name="Wurth Elektronik", Manufacturer_Part_Number=151031YS06000, Mouser Part Number=710-151031YS06000, Datasheet Link=https://katalog.we-online.de/led/datasheet/151031YS06000.pdf, Geometry.Height=5.5mm, Mouser Price/Stock=https://www.mouser.co.uk/ProductDetail/Wurth-Elektronik/151031YS06000?qs=LlUlMxKIyB3xSYYW%252BcuBiQ%3D%3D
D11: "WURTH ELEKTRONIK - 151031YS06000 - LED, Yellow, Through Hole, T-1 (3mm), 30 mA, 2 V, 590 nm", Manufacturer_Name="Wurth Elektronik", Manufacturer_Part_Number=151031YS06000, Mouser Part Number=710-151031YS06000, Datasheet Link=https://katalog.we-online.de/led/datasheet/151031YS06000.pdf, Geometry.Height=5.5mm, Mouser Price/Stock=https://www.mouser.co.uk/ProductDetail/Wurth-Elektronik/151031YS06000?qs=LlUlMxKIyB3xSYYW%252BcuBiQ%3D%3D
J4: library part 691101710003, "WR-TBL Series 101 Horizontal Entry Modular, Through Hole, pitch 5mm, 3p", Manufacturer="Wurth Elektronik", Operating Temperature Max=105°C, Operating Temperature Min=-40°C, Rated Current=16A, Working Voltage=250V, Application="Pressure Clamp", Category="Terminal Blocks", ComponentLink1Description="Manufacturer Link", ComponentLink1URL=https://www.we-online.com/redexpert/article/691101710003?ad, ComponentLink2Description=Datasheet, ComponentLink2URL=https://www.we-online.com/redexpert/spec/691101710003?ad, Manufacturer Part Number=691101710003, Match Code=WR-TBL, Modularity=Yes, Mount="Through Hole", Orientation=Horizontal, Packaging=Box, PCB/Cable/Panel=PCB, Pin Number=3, Pitch=5mm
JE1: library part JE
L1: library part 744775147, "WE-PD2 SMT Power Inductor, size 7850, 47µH, 1.17A, 0.18Ω", Case/Size Code=7850, DC Resistance=0.134Ω, DC Resistance Max=0.18Ω, Inductance=47µH, Manufacturer="Wurth Elektronik", Operating Temperature Max=125°C, Operating Temperature Min=-40°C, Rated Current=1.17A, Saturation Current=1.24A, Self Resonant Frequency=12MHz, Category="Unshielded Power Inductors", ComponentLink1Description="Website Link", ComponentLink1URL=https://www.we-online.com/redexpert/article/744775147?ad, ComponentLink2Description="Datasheet Link", ComponentLink2URL=https://www.we-online.com/redexpert/spec/744775147?ad, Height=4.95mm, Length=7.8mm, Manufacturer Part Number=744775147, Match Code=WE-PD2, Mount="Surface Mount", Packaging="Tape and Reel", Width=7mm, Simulation ModelName=7850_744775147_47u, Simulation ModelText=".subckt 7850_744775147_47u 1 2 / Rp 1 2 40000 / Cp 1 2 4p / Rs 1 N3 0.1343 / L1 N3 2 47u / .ends 7850_744775147_47u", Simulation PortMap=(1:1),(2:2)
L2: library part 74477530, "WE-PD2 SMT Power Inductor, size 7850, 1000µH, 0.3A, 3.3Ω", Case/Size Code=7850, DC Resistance=2.78Ω, DC Resistance Max=3.3Ω, Inductance=1000µH, Manufacturer="Wurth Elektronik", Operating Temperature Max=125°C, Operating Temperature Min=-40°C, Rated Current=0.3A, Self Resonant Frequency=2.4MHz, Category="Unshielded Power Inductors", ComponentLink1Description="Website Link", ComponentLink1URL=https://www.we-online.com/redexpert/article/74477530?ad, ComponentLink2Description="Datasheet Link", ComponentLink2URL=https://www.we-online.com/redexpert/spec/74477530?ad, Height=4.95mm, Length=7.8mm, Manufacturer Part Number=74477530, Match Code=WE-PD2, Mount="Surface Mount", Packaging="Tape and Reel", Saturation Current=0.3A, Width=7mm, Simulation ModelName=7850_74477530_1m, Simulation ModelText=".subckt 7850_74477530_1m 1 2 / Rp 1 2 187304.915771 / Cp 1 2 4.36976277949p / Rs 1 N3 3.3 / L1 N3 2 1000u / .ends 7850_74477530_1m", Simulation PortMap=(1:1),(2:2)
P1: "WR-WTB Male Vertical Shrouded Header, pitch 2mm, 4p", Contact Resistance=20mOhm, Operating Temperature="-25 to +85degC", Rated Current=2A, Withstanding Voltage=800VAC, Working Voltage=125VAC, ComponentLink1Description=Manufacturer, ComponentLink1URL=http://www.we-online.de, ComponentLink2Description=Datasheet, ComponentLink2URL=https://www.we-online.com/catalog/datasheet/62000411622.pdf, Gender=Male, Mounting Technology=THT, Packaging=Bag, Part Number=62000411622, Pin Number=4, Pitch=2mm, Published Date="January 2020", Publisher="Wurth Elektronik", Type=Vertical
P2: "WR-PHD Pin Header, THT, Angled, pitch 2.54mm, 1 Row, 16P", Contact Resistance=20mΩ, Manufacturer="Wurth Elektronik", Operating Temperature Max=105°C, Operating Temperature Min=-40°C, Rated Current=3A, Withstanding Voltage=500V, Working Voltage=250V, Category="Board-to-Board Connectors", ComponentLink1Description="Website Link", ComponentLink1URL=https://www.we-online.com/redexpert/article/61301611021?ad, ComponentLink2Description="Datasheet Link", ComponentLink2URL=https://www.we-online.com/redexpert/spec/61301611021?ad, Gender="Pin Header", Manufacturer Part Number=61301611021, Match Code=WR-PHD, Mount="Through Hole", Number of Pins=16, Number of Rows=1, Orientation=Angled, Packaging=Bag, Pitch=2.54mm
R1 R2 R3 R5 R7 R9 R11 R12 R13 R14 R15 R16 R17 R18 R19 R20 R21 R22 R23 R24 R25 R26 R27 R28 R29 R30 R31 R32 R33 R34 R35 R36 R37 R38 R39 R40 R41 R42 R43 R44 R45 R46 R47 R48 R49 R50 R51 R52 R53 R54 R55 R56: library part RES-CONST
R4 R6: library part RES-CONST, "2K"
R8 R10: library part RES-CONST, "10K"
TP1 TP2 TP3 TP4 TP5 TP6 TP7 TP8 TP9 TP10 TP12 TP13 TP14 TP15 TP16 TP17 TP18 TP19 TP20 TP21 TP22 TP23 TP24 TP25 TP26 TP27 TP28 TP29 TP30 TP31 TP32 TP33 TP34 TP35 TP36 TP37 TP38 TP39 TP40 TP41 TP42: library part TP_PCB?, "Test_Point"
U1: "SOIC-20"
U2 U3: "TL494 Pwm controller"
U4: library part CMP-0062-01032-3, "Series of Adjustable Micropower Voltage Regulators, 8-pin Narrow SOIC", Manufacturer="Texas Instruments", PackageTopMarking=NSZXTT*2951A*CM33DD, PowerWise=N, Code_IPC=SOIC127P600-8, Code_JEDEC=MS-012-AA, ComponentLink1Description="Datasheet URL", ComponentLink1URL=http://www.ti.com/general/docs/lit/getliterature.tsp?genericPartNumber=LP2951-N&fileType=pdf, CompType="LDO IC", PackageDescription="SOIC Narrow, 4.9 x 3.9 x 1.45mm, 8 Lead, 1.27mm Pitch", PackageReference=D0008A, PinCount=8, RoHS=N
U7: library part CMP-0534-00565-1, "Quad Channel Digital Isolator, 2.5 KV rms Insulation Rating, 10 Mbps Data Rate, 50 ns Delay, Industrial, 16-pin SOIC (RW-16), Tube", Manufacturer="Analog Devices", Max Operating Temp (degreesC)=125, Code_JEDEC=MS-013-AA, ComponentLink1Description="Manufacturer URL", ComponentLink1URL=http://www.analog.com/en/index.html, ComponentLink2Description=Datasheet, ComponentLink2URL=http://www.analog.com/static/imported-files/data_sheets/ADuM1400_1401_1402.pdf, ComponentLink3Description="Package Specification", ComponentLink3URL=http://www.analog.com/static/imported-files/packages/PKG_PDF/SOIC_WIDE%20%28RW%29/RW_16.pdf, ComponentLink4Description="URL Link1", ComponentLink4URL="Product URL:http://www.analog.com/en/interface-isolation/digital-isolators/adum1401/products/product.html", ComponentLink5Description="URL Link2", ComponentLink5URL="Reference Circuit:http://www.analog.com/en/interface-isolation/digital-isolators/adum1401/products/product.html#product-recommendations", DatasheetVersion="Rev. H", Max Data Rate=10Mbps, Mounting Technology="Surface Mount", PackageDescription="16-Pin Standard Small Outline Package, Body 10.3 x 7.5 mm, Pitch 1.27 mm", PackageReference=RW-16, PackageVersion="032707-B, 03/2007", PartNumber=ADUM1401BRWZ
VD1 VD2: library part ESD_Unidirect

## Via types
v1: diameter 0.8, hole 0.5, Top Layer to Bottom Layer, tented both sides, 37 vias
v2: diameter 0.8, hole 0.4, Top Layer to Bottom Layer, tented both sides, 34 vias

## Nets (pads, with @x,y where several pads share a name; then routed paths per layer and width w, separated by ;. In a path a pad name is that pad's centre, name@x,y a point inside that pad or via, vN(x,y) a via of type N, cw(c..) or ccw(c..) an arc to the next point about the centre after c; other vN are vias at no path point)
+3v3: C31.1 C38.2 J1.1 J3.1 L3.2 R1.1 R13.2 R16.2 R19.2 R24.1 R42.2 R44.2 TP25.1 TP34.1 U1.4 U7.1 U7.7 | length 113
  Top Layer w0.5: J3.1 47.758,37.159 47.758,35.942 52.211,31.489 J1.1 53.79,35.19 63.457,44.857 TP34.1 ; TP25.1 49.179,61.05 50.875,59.354 50.875,54 v2(55.825,49.05) ; v1(74.425,44.725) 76.041,43.109 80.566,43.109 C31.1@81.316,43.859
  Top Layer w1: C31.1@81.316,43.859 L3.2
  Bottom Layer w0.4: U1.4 C38.2@64.962,40.314
  Bottom Layer w0.5: U7.7 39.154,53.366 38.825,53.695 38.825,60.604 39.207,60.986 U7.1 40.928,60.975 R44.2 ; R44.2@44.05,60.925 R42.2@45.8,60.925 ; R42.2 TP25.1@49.25,60.975 ; R16.2 55.786,49.089 v2(55.825,49.05) 55.864,49.089 60.403,49.089 60.553,48.939 60.553,48.343 60.845,48.05 65.15,48.05 65.2,48 ; C38.2 TP34.1 65.2,44.9 65.2,48 ; TP34.1@65.275,44.825 74.244,44.825 74.344,44.725 v1(74.425,44.725) ; R24.1 R19.2 65.982,48.782 65.2,48
+5V: C35.1 C36.2 L4.2 P1.1 TP28.1 U6.2 | length 62.5
  Top Layer w0.5: U6.2 37.57,67.555 39.015,69 44.4,69 59.511,53.889 59.567,53.889 P1.1
  Top Layer w1: v1(71.241,59.525) 69.791,59.525 69.291,60.025 C35.1 69.791,61.35 69.791,62.375 71.466,64.05 v1(78.425,64.05)
  Bottom Layer w1: P1.1@60.003,53.525 67.55,53.525 71.291,57.266 C36.2 ; C36.2@71.241,58.505 v1(71.241,59.525) ; v1(78.425,64.05) 78.9,64.525 81.578,64.525 L4.2
+5V_ISO: C37.1 R48.2 R50.2 R51.2 TP31.1 U6.4 U7.10 U7.16 U8.8 | length 55.2
  Bottom Layer w0.5: R51.2 19.431,51.181 R50.2 20.704,51.227 20.704,56.063 19.637,57.13 U8.8 17.165,57.13 17.15,57.145 R48.2 17.15,62.515 22.085,67.45 TP31.1 ; TP31.1@28.4,67.475 U6.4 28.5,63.485 C37.1 28.589,60.986 U7.16 33.225,60.986 33.725,60.486 33.725,53.925 33.169,53.369 31.67,53.369 U7.10
+12: C26.1 C28.2 L1.2 P2.1 R32.2 R34.2 R36.2 R38.2 | length 55.3
  Top Layer w0.5: C26.1@72.453,12.412 C26.1@72.688,12.412 ; C26.1@72.616,12.441 72.975,12.8 C26.1@73.053,12.879
  Top Layer w1: P2.1@64.12,3.77 64.12,3.84 64.375,4.095 64.445,4.095 C26.1@71.975,11.625 ; C26.1 72.975,15.175 73.975,16.175 76.425,16.175 77.83,14.77 77.83,10.92 79.55,9.2 C28.2@81.05,9.2 ; v2(80.818,12.474) 83.699,12.474 84.1,12.875 L1.2 ; C28.2@81.1,9.2 82.2,9.2 83.2,10.2 83.2,11.9 L1.2@83.736,12.436
  Bottom Layer w0.5: R34.2 R38.2 71.335,12.474 ; R32.2 R36.2 71.335,12.474 ; v2(80.818,12.474) 71.335,12.474
GND: C5.1 C6.1 C7.1 C8.1 C9.1 C10.1 C13.2 C14.2 C17.1 C18.1 C19.2 C20.1 C21.1 C22.1 C23.2 C24.2 C25.2 C26.2 C27.1 C28.1 C29.2 C30.1 C31.2 C32.1 C33.2 C34.1 C35.2 C36.1 C38.1 D11.2 J1.6 J2.1 J3.6 JE1.2 P1.4 P2.4 P2.5 P2.10 R2.2 R3.2 R5.2 R7.2 R9.2 R11.2 R12.2 R15.2 R18.2 R23.2 R28.2 R29.2 R30.2 R31.2 R40.1 R41.1 R45.1 R54.1 R56.1 TP10.1 TP23.1 U1.5 U2.7 U2.9 U2.10 U3.7 U3.9 U3.10 U4.4 U5.1 U6.1 U7.2 U7.8 VD1.1 VD2.1 | length 7.4
  Bottom Layer w0.4: U1.5 62.376,39.664 62.701,39.339 64.135,39.339 64.817,38.657 64.817,38.569 65.017,38.369 C38.1
  Bottom Layer w1: VD2.1 VD1.1
  other v2: 45.017,5.075 49.015,17.229 78.6,22.425 85.452,24.916 81.067,30.1 86.175,30.1 86.328,38.698 81.294,38.769 56.875,50.6 42.692,52.117 42.692,59.725
GND_2: C37.2 J4.2 R49.1 R52.1 TP33.1 U6.3 U7.9 U7.15 U8.5 ZD1.1 ZD2.1 | length 4.7
  Bottom Layer w1: J4.2 10.975,54.875
  other v2: 28.5,58.557
NetC1_1: C1.1 C2.2 D1.1 R2.1 R53.2 TP1.1 U2.4 | length 36.5
  Top Layer w0.5: v1(13.55,32.075) 13.55,22.804 v1@14.491,21.862
  Bottom Layer w0.5: C2.2@2.85,27.572 2.85,27.422 3.7,26.572 C2.2 ; 3.825,24.522 3.825,26.547 C2.2 ; TP1.1 7.65,28.872 7.5,29.022 C1.1 7.27,28.942 6.345,28.942 4.85,27.447 4.85,27.422 4,26.572 C2.2 ; TP1.1@7.867,26.781 8.967,26.781 10,25.747 10,23.583 10.293,23.29 10.886,23.29 11.036,23.14 R2.1 ; R2.1@11.025,22.734 11.186,22.572 11.675,22.572 12.31,21.937 13.25,21.937 U2.4 v1(14.524,21.862) ; R53.2@13.325,37.375 13.545,37.155 13.545,32.08 v1(13.55,32.075)
NetC1_2: C1.2 C2.1 C3.2 C4.1 C20.2 C22.2 C23.1 C25.1 P2.15 R4.1 R6.1 R8.1 R10.1 TP5.1 TP6.1 U2.13 U2.14 U3.13 U3.14 | length 141.6
  Top Layer w0.5: v1(8.375,31.022) 9.375,31.022 10.9,29.497 10.9,12.475 10.38,11.955 10.349,11.955 10.199,11.805 v2(10.118,11.805) ; v1(34.015,30.45) 35.075,30.45 36.39,29.135 36.39,11.241 v1(35.4,10.25)
  Bottom Layer w0.5: C2.1 4,33.472 4.85,32.622 4.85,32.522 6.307,31.065 7.307,31.065 C1.2 v1(8.375,31.022) ; TP5.1 9.209,10.206 R8.1@9.209,11.739 ; R8.1 v2(10.118,11.805) 11.27,11.805 11.27,11.753 11.368,11.655 11.42,11.655 13.475,9.6 19.275,9.6 22.2,12.525 22.2,20.676 21.475,21.401 21.475,21.685 C20.2 19.002,21.835 U2.13 U2.14 ; C20.2@21.475,21.985 21.475,22.699 22.018,23.242 22.2,23.242 C23.1 23.2,24.092 24.05,24.942 24.05,25.092 26.45,27.492 26.45,29.964 28.386,31.9 28.615,31.9 C4.1 29.615,32.75 30.465,31.9 30.465,31.75 31.815,30.4 C3.2 32.99,30.425 33.99,30.425 v1(34.015,30.45) ; P2.15 28.49,6.104 32.559,10.172 TP6.1 ; TP6.1@32.511,10.13 TP6.1@33.178,10.13 ; TP6.1@32.7,10.158 34.398,10.158 R10.1 v1(35.4,10.25) R6.1 36.44,10.1 36.775,10.1 38.525,8.35 44.475,8.35 48.015,11.89 48.015,19.228 46.763,20.48 C22.2 46.748,20.69 U3.13 U3.14 ; C22.2@46.913,20.855 46.913,21.698 48.415,23.2 C25.1
NetC3_1: C3.1 C4.2 D2.1 R3.1 R55.2 TP2.1 U3.4 | length 37.6
  Top Layer w0.5: v1(39.1,36.45) 39.1,21.645 v1(40.04,20.705)
  Bottom Layer w0.5: 29.44,23.65 29.44,25.825 C4.2 ; C4.2@29.472,25.857 29.622,25.857 30.465,26.7 30.465,26.85 31.947,28.332 32.897,28.332 C3.1 32.99,28.4 33.14,28.25 33.14,26.025 TP2.1 34.64,25.975 35.34,25.275 35.34,22.118 35.633,21.825 36.265,21.825 R3.1 36.29,21.575 36.44,21.425 37.04,21.425 37.7,20.765 38.715,20.765 38.782,20.697 40.032,20.697 v1(40.04,20.705) ; R55.2 39.076,37.504 39.076,36.474 v1(39.1,36.45)
NetC5_2: C5.2 C15.2 R4.2 R5.1 R26.1 TP3.1 U2.15 | length 16.2
  Bottom Layer w0.5: R4.2 10.997,13.801 12.821,13.801 12.825,13.797 TP3.1@12.825,13.871 ; TP3.1 13.05,13.972 15.069,15.991 16.025,15.991 C15.2 17.867,16.055 20.626,16.055 21.15,16.579 21.15,17.503 C5.2 R5.1 U2.15
NetC6_2: C6.2 C16.2 R6.2 R7.1 R27.1 TP4.1 U3.15 | length 16.7
  Bottom Layer w0.5: R6.2 38.49,12.25 TP4.1 ; TP4.1@38.515,12.325 40.872,14.682 41.772,14.682 C16.2 R27.1 45.59,14.775 46.812,15.997 46.865,15.997 R7.1@46.865,16.407 ; U3.15 44.443,18.153 45.988,18.153 46.854,18.153 R7.1@46.854,16.407
NetC7_2: C7.2 C11.2 R8.2 R9.1 R22.1 TP7.1 U2.2 | length 22.7
  Bottom Layer w0.5: TP7.1 R8.2 9.275,13.805 9.425,13.655 9.425,13.055 9.718,12.762 12.035,12.762 14.01,10.787 R22.1 C11.2 ; R8.2@9.443,13.805 9.593,13.955 9.593,14.54 10.025,14.972 10.025,18.804 10.318,19.097 10.875,19.097 R9.1@11.025,19.247 ; C7.2 11.019,21.204 11.019,19.478 R9.1 11.175,19.322 U2.2
NetC8_2: C8.2 C12.2 R10.2 R11.1 R25.1 TP8.1 U3.2 | length 23.5
  Bottom Layer w0.5: TP8.1@32.46,12.325 R10.2@34.415,12.325 ; R10.2 34.715,12.25 34.865,12.1 34.865,11.543 35.158,11.25 37.315,11.25 39.065,9.5 R25.1 C12.2 ; R10.2@34.69,12.25 34.84,12.4 34.84,13.212 35.34,13.713 35.34,17.682 35.633,17.975 36.215,17.975 36.39,18.15 U3.2 ; R11.1@36.29,18.343 R11.1 C8.2@36.29,20
NetC9_2: C9.2 R14.2 R15.1 TP12.1 U2.1 | length 18.8
  Top Layer w0.5: v1@12.027,18.079 v2@12.027,28.013
  Bottom Layer w0.5: R15.1 11.006,15.979 11.006,17.709 C9.2 11.013,17.902 11.163,18.052 v1(12,18.052) U2.1 ; R14.2@11.975,29.153 11.975,31.761 TP12.1@12.31,32.096 ; v2(12,28.022) R14.2 ; TP12.1@12.235,31.923 TP12.1@12.235,32.275
NetC10_2: C10.2 R17.2 R18.1 TP13.1 U3.1 | length 19.2
  Top Layer w0.5: v1(37.415,16.88) v1(37.415,27.05)
  Bottom Layer w0.5: R18.1 C10.2 36.29,16.73 36.44,16.88 v1(37.415,16.88) U3.1 ; v1(37.415,27.05) R17.2 TP13.1@37.415,31.6
NetC11_1: C11.1 C15.1 D9.1 R22.2 R26.2 TP14.1 U2.3 | length 21.1
  Top Layer w0.5: v2(14.875,14.055) v2(14.875,20.607) ; TP14.1 20.67,13.989 22.884,11.775 D9.1
  Bottom Layer w0.5: U2.3 13.34,20.607 v2(14.875,20.607) ; v2(14.875,14.055) C15.1 16.087,14.053 16.087,12.79 R22.2 C11.1 17.852,12.803 17.852,14.04 R26.2@17.892,14.08 ; R26.2 17.792,14.055 TP14.1@20.85,14.055
NetC12_1: C12.1 C16.1 D10.1 R25.2 R27.2 TP15.1 U3.3 | length 19.6
  Top Layer w0.5: v1@40.54,12.825 v1(40.54,19.42) ; TP15.1 D10.1@49.165,12.674
  Bottom Layer w0.5: U3.3 38.802,19.432 40.528,19.432 v1(40.54,19.42) ; v1(40.515,12.8) 40.54,12.775 C16.1 R25.2 C12.1 R27.2 43.665,12.725 46.45,12.725 TP15.1@46.525,12.65
NetC13_1: C13.1 C14.1 C17.2 C18.2 C19.1 C21.2 C32.2 L1.1 L2.1 TP16.1 TP17.1 TP18.1 U2.12 U3.12 U5.3 | length 190.1
  Top Layer w0.5: v1(17.75,23.14) 17.75,32.174 TP16.1 15.349,34.7 16.792,36.143 22.625,36.143 23.375,36.893 C13.1 C13.1@23.42,37.645 ; C14.1 32.191,37.354 32.406,37.57 39.63,37.57 40.917,36.283 40.917,33.67 TP17.1 ; v1(43.215,21.96) v1(43.215,33.625)
  Top Layer w0.8: v1(76.2,56.986) 80.239,56.986 84.452,52.773 84.452,45.733 83.675,44.956 83.675,27.95 C19.1@82.141,26.416
  Top Layer w1: C13.1@23.42,37.645 27.65,37.645 ; v1(27.65,39.925) 27.65,37.645 ; C14.1 27.65,37.645 ; L2.1 TP18.1 C21.2 ; C21.2@75.627,22.491 75.627,23.716 76.302,24.391 78.077,24.391 78.802,25.116 78.802,25.166 79.552,25.916 C19.1 81.052,26.416 C19.1@82.141,26.416 ; C19.1@81.5,25.916 82,25.416 82,18.875 83,17.875 L1.1
  Bottom Layer w0.5: TP16.1@15.177,34.522 C17.2 ; v1(17.75,23.14) 17.754,23.136 18.971,23.136 U2.12 ; v1(27.65,39.925) 30.138,42.413 39.884,42.413 45.675,48.205 45.675,50.25 51.331,55.906 62.276,55.906 68.799,62.429 U5.3 ; TP17.1@41.69,33.625 C18.2 ; C18.2 v1(43.215,33.625) ; v1(43.215,21.96) 43.227,21.948 44.428,21.948 U3.12 ; C32.2@74.362,62.429 C32.2 75.457,62.425 76.2,61.682 v1(76.2,56.986)
  Bottom Layer w1: U5.3 C32.2@74.362,62.429
NetC24_1: C24.1 C27.2 L2.2 TP19.1 U4.8 | length 19.1
  Top Layer w1: L2.2 80.752,32.216 81.338,32.802 81.338,34.016 80.838,34.516 79.566,34.516 79.066,35.016 79.066,35.105 78.48,35.691 TP19.1@75.877,35.691
  Bottom Layer w0.5: TP19.1 C27.2 U4.8
NetC29_1: C29.1 C30.2 L3.1 TP20.1 U4.1 U4.2 | length 22.4
  Top Layer w0.5: TP20.1 78.859,50.908 80.91,50.908 L3.1
  Bottom Layer w0.5: TP20.1 C29.1 ; TP20.1@76.127,47.876 TP20.1@76.139,47.863 ; C30.2 C30.2@79.797,51.396 ; U4.1 U4.2
  Bottom Layer w0.6: U4.1 C30.2@79.797,51.396
NetC33_1: C33.1 C34.2 L4.1 U5.2 | length 25.6
  Top Layer w1: v1(78.039,58.45) 78.039,60.852 C33.1 78.016,61.875 78.516,62.375 79.472,62.375 v1(79.497,62.4)
  Bottom Layer w1: U5.2@64.95,64.719 75.531,64.719 78,62.25 v1@78,58.489 ; v1(79.497,62.4) 81.703,62.4 L4.1
NetD1_2: D1.2 D2.2 P2.16 | length 52.6
  Bottom Layer w0.5: 3.825,21.372 3.825,12.875 12.8,3.9 25.82,3.9 P2.16 25.95,17.01 29.215,20.275 29.215,20.3 29.415,20.5 29.44,20.5
NetD3_1: D3.1 R14.1 | length 1.3
  Bottom Layer w0.5: R14.1@14.302,29.139 15.627,29.139
NetD3_2: D3.2 D4.2 P2.2 | length 66.6
  Top Layer w0.5: v1(21.35,28.461) 24.806,28.461 30.692,34.347 v1(33.127,34.347) ; v1(50.272,27.266) 50.33,27.209 50.691,27.209 55.847,22.053 55.847,9.433 P2.2
  Bottom Layer w0.5: 18.777,29.139 20.672,29.139 v1(21.35,28.461) ; v1(33.127,34.347) 37.128,34.347 39.525,31.95 42.65,31.95 43.375,31.225 43.375,28.833 43.883,28.325 ; 44.09,28.1 44.09,28.075 44.29,27.875 44.408,27.875 45.017,27.266 v1(50.272,27.266)
NetD4_1: D4.1 R17.1 | length 1.4
  Bottom Layer w0.5: R17.1@39.652,28.1 41.052,28.1
NetD5_1: D5.1 R19.1 | length 2.5
  Top Layer w0.5: v2(67.174,45.7) D5.1
  Bottom Layer w0.5: v2(67.174,45.7) 67.174,46.632 67.324,46.782 R19.1
NetD5_2: D5.2 J2.2 R24.2 TP9.1 U1.7 | length 24.4
  Top Layer w0.5: D5.2 69.445,46.786 TP9.1@71.317,46.786 ; J2.2 71.842,40.491 71.842,46.698 TP9.1 ; TP9.1@71.174,46.957 TP9.1@71.317,46.814
  Bottom Layer w0.4: U1.7 60.747,38.36 61.779,38.36 62.926,37.213 68.565,37.213 J2.2 ; TP9.1@71.617,46.75 71.649,46.782 TP9.1@71.817,46.95
  Bottom Layer w0.5: R24.2 71.649,46.782 TP9.1@71.742,46.782
NetD6_1: D6.1 U1.3 | length 4.3
  Top Layer w0.4: D6.1 v2(63.43,41.589)
  Bottom Layer w0.4: U1.3 62.245,40.964 62.843,41.562 63.403,41.562 v2(63.43,41.589)
NetD6_2: D6.2 R23.1 | length 1.7
  Top Layer w0.4: R23.1 65.43,40.178 D6.2
NetD7_1: D7.1 U2.16 | length 18.1
  Top Layer w0.5: v2(17.75,18.023) 19.1,19.373 19.1,30.522 v2(21.15,32.572)
  Bottom Layer w0.5: v2(17.75,18.023) 17.765,18.038 18.96,18.038 U2.16 ; v2(21.15,32.572) 21.175,32.597 21.175,33.447 21.2,33.472
NetD7_2: D7.2 D8.2 P2.3 | length 60.1
  Top Layer w0.5: v1(53.975,19.2) 53.975,8.765 P2.3
  Bottom Layer w0.4: 24.35,33.472 24.35,33.497 24.55,33.697 24.575,33.697 26.228,35.35 45.836,35.35 48.711,32.475 50.09,32.475 50.09,32.45 50.29,32.25 50.315,32.25 50.775,31.79 50.775,29.166 53.975,25.966 v1(53.975,19.2)
NetD8_1: D8.1 U3.16 | length 18.2
  Top Layer w0.5: v1(43.315,16.88) 46.05,19.615 v1(46.05,31.45)
  Bottom Layer w0.5: v1(43.315,16.88) U3.16 ; v1(46.05,31.45) 46.097,31.45 46.74,32.093 46.74,32.275 46.94,32.475
NetD9_2: D9.2 R40.2 | length 1.8
  Top Layer w1: D9.2 R40.2@25.82,9.675
NetD10_2: D10.2 R41.2 | length 1.7
  Top Layer w0.5: D10.2@49.175,10.599 R41.2@50.899,10.599
NetD11_1: D11.1 R43.1 | length 1.9
  Top Layer w0.5: D11.1 v2(46.35,54.821)
  Bottom Layer w0.5: v2(46.35,54.821) 46.375,54.796 46.375,54.011 R43.1
NetJ1_2: J1.2 U1.8 | length 8.9
  Bottom Layer w0.4: J1.2 56.33,31.88 58.217,33.767 58.217,36.564 59.367,37.714 U1.8
NetJ1_3: J1.3 U1.9
NetJ1_4: J1.4 U1.10
NetJ1_5: J1.5 U1.11
NetJ3_2: J3.2 U1.18 | length 7.8
  Bottom Layer w0.4: J3.2 48.992,40.964 U1.18
NetJ3_3: J3.3 R12.1 U1.19 | length 9.5
  Bottom Layer w0.4: R12.1 47.727,42.239 J3.3 49.102,42.254 49.742,41.614 U1.19
NetJ3_4: J3.4 R44.1 TP27.1 U1.20 U7.4 | length 38.1
  Top Layer w0.5: TP27.1@44.036,65.636 v2(44.036,59.775) 41.325,57.064 41.325,51.15 47.681,44.794 J3.4
  Bottom Layer w0.4: J3.4 50.272,42.264 U1.20
  Bottom Layer w0.5: U7.4 40.955,57.214 43.132,57.214 44.036,58.118 44.036,58.961 R44.1 44.043,58.982 44.043,59.768 v2(44.036,59.775)
NetJ3_5: J3.5 R42.1 TP24.1 U1.1 U7.6 | length 34.5
  Top Layer w0.5: v2(42.725,54.636) 45.8,57.711 v2(45.8,57.725) ; v2@42.75,54.611 42.75,53.296 44.3,51.746 44.3,50.704 47.669,47.334 J3.5 ; J3.5@47.653,47.334 53.887,47.334 v2@58.982,42.239
  Bottom Layer w0.4: v2(59.025,42.239) 59.05,42.264 U1.1
  Bottom Layer w0.5: U7.6 v2(42.725,54.636) ; v2(45.8,57.725) R42.1 48.284,58.975 TP24.1@48.334,58.925
NetJ4_1: J4.1 R52.2 U8.7 ZD2.2 | length 16
  Bottom Layer w0.5: ZD2.2 10.975,61.575 11.925,60.625 11.95,60.625 13.725,58.85 15.482,58.85 15.775,58.557 15.775,56.153 16.068,55.86 U8.7
  Bottom Layer w1: J4.1 9.275,59.875 10.025,60.625 ZD2.2@10.975,61.575
NetJ4_3: J4.3 R51.1 U8.6 ZD1.2 | length 21.4
  Bottom Layer w0.5: ZD1.2 11.925,48.847 11.925,49.164 15.825,53.064 15.825,54.297 16.118,54.59 U8.6 17.5,54.575 18.775,54.575 19.125,54.225 19.125,52.65 18.025,51.55 17.575,51.55 17.425,51.4 R51.1
  Bottom Layer w1: J4.3 9.25,49.875 10.228,48.897 10.275,48.897 ZD1.2@10.975,48.197
NetJE1_1: JE1.1 U4.3 | length 2.4
  Bottom Layer w0.5: U4.3 JE1.1@82.337,43.498
NetP1_2: P1.2 R20.2 | length 6.2
  Bottom Layer w0.5: P1.2 57.967,53.397 61.567,49.797 61.567,49.239 61.717,49.089 R20.2
NetP1_3: P1.3 R21.2 | length 6.2
  Bottom Layer w0.5: R21.2 52.117,49.089 52.267,49.239 52.267,49.789 P1.3
NetP2_6: P2.6 R36.1 R37.2 | length 31.3
  Top Layer w0.5: P2.6 51.35,3.65 53.2,1.8 66.598,1.8 70.425,5.627 v2(70.425,5.675)
  Bottom Layer w0.5: R37.2@68.275,14.121 R36.1@69.051,14.121 ; R36.1 69.335,13.896 70.425,12.806 v2(70.425,5.675)
NetP2_7: P2.7 R37.1 TP41.1 U3.8 | length 78
  Top Layer w0.5: v1(40.175,25.725) 41.77,24.13 41.77,10.81 P2.7 ; v1(56.617,36.399) 56.632,36.414 59.461,36.414 63.95,31.925 63.95,31.071 62.926,30.047 62.926,15.625 TP41.1
  Bottom Layer w0.4: 54.992,36.414 55.765,36.414 55.78,36.399 v1(56.617,36.399)
  Bottom Layer w0.5: U3.8 38.812,25.747 40.153,25.747 v1(40.175,25.725) ; P2.7 59.161,14.121 TP41.1 ; TP41.1@64.825,14.121 R37.1@66.275,14.121
NetP2_8: P2.8 R32.1 R33.2 | length 28.9
  Bottom Layer w0.5: P2.8 58.125,15.625 66.375,15.625 67.926,17.176 67.93,17.176 68.08,17.326 R33.2 R32.1
NetP2_9: P2.9 R33.1 TP38.1 U3.11 | length 46.7
  Bottom Layer w0.5: P2.9 43.73,5.53 51.14,12.94 51.14,17.66 ; U3.11 44.452,23.217 45.752,23.217 46.363,23.828 46.363,24.538 47.1,25.275 50.115,25.275 51.14,24.25 51.14,17.66 ; TP38.1 51.249,17.551 51.14,17.66 ; TP38.1@64.535,17.551 R33.1@65.985,17.551
NetP2_11: P2.11 R38.1 R39.2 | length 43.7
  Top Layer w0.5: P2.11 41.77,0.65 68.307,0.65 68.732,1.075 v2(68.75,1.075)
  Bottom Layer w0.5: v2(68.75,1.075) 68.75,4.875 67.05,6.575 67.05,9.534 67.93,10.414 67.93,10.676 R39.2 R38.1@69.33,10.826
NetP2_12: P2.12 R39.1 TP42.1 U2.8 | length 114
  Top Layer w0.5: v1(14.75,26.92) 14.75,23.865 16.385,22.23 16.385,10.69 25.575,1.5 33.84,1.5 P2.12 ; 58.87,31.489 58.87,14.855 62.899,10.826 TP42.1
  Bottom Layer w0.4: 58.87,31.489 58.87,36.367 59.567,37.064 60.743,37.064
  Bottom Layer w0.5: U2.8 13.348,26.92 v1(14.75,26.92) ; P2.12 37.591,2.289 65.014,2.289 65.625,2.9 65.625,5.054 64.43,6.249 TP42.1 ; TP42.1@64.53,10.826 R39.1@65.98,10.826
NetP2_13: P2.13 R34.1 R35.2 | length 42.2
  Top Layer w0.5: v2(66.725,3.568) 68.7,5.543 v2(68.7,6.35)
  Bottom Layer w0.5: P2.13 35.865,1.475 65.5,1.475 66.725,2.7 v2(66.725,3.568) ; R35.2 68.23,7.49 68.23,6.82 v2(68.7,6.35) 69.185,6.835 69.185,7.49 R34.1
NetP2_14: P2.14 R35.1 TP39.1 U2.11 | length 104.6
  Top Layer w0.5: v1(20.55,24.4) 31,13.95 P2.14@31,3.8 ; 61.41,31.489 61.41,19.925 61.41,14.575 63.485,12.5 65.063,12.5 66.075,11.488 v1(66.075,8.85)
  Bottom Layer w0.4: 60.743,36.414 61.917,36.414 62.425,35.906 62.425,34.525 61.41,33.51 61.41,31.489
  Bottom Layer w0.5: U2.11 20.548,24.402 v1(20.55,24.4) ; P2.14 34.125,0.675 66,0.675 67.75,2.425 67.75,4.525 66.08,6.195 66.08,7.865 66.078,7.868 66.078,8.848 v1(66.075,8.85)
NetR1_2: R1.2 U1.6 | length 3
  Bottom Layer w0.4: U1.6 62.044,39.014 62.489,38.569 63.292,38.569 R1.2
NetR13_1: R13.1 R20.1 U1.16 VD1.2 | length 13.4
  Bottom Layer w0.4: U1.16 56.468,39.664 57.317,40.513 57.317,44.924 58.079,45.686 VD1.2
  Bottom Layer w0.5: VD1.2 58.082,47.089 R13.1 R20.1
NetR16_1: R16.1 R21.1 U1.17 VD2.2 | length 12.4
  Bottom Layer w0.4: U1.17 56.27,40.314 56.617,40.662 56.617,44.889 55.742,45.764 VD2.2
  Bottom Layer w0.5: R21.1 R16.1 VD2.2@55.739,47.089
NetR28_1: R28.1 TP35.1 U1.15 U2.5 | length 57.5
  Top Layer w0.4: TP35.1@15.312,31.288 TP35.1 ; v1(44.225,41.025) 44.253,41.053 48.934,41.053 v1(50.272,39.714)
  Bottom Layer w0.4: v1(50.272,39.714) 50.972,39.014 U1.15
  Bottom Layer w0.5: U2.5 14.905,23.132 16.892,25.12 R28.1@16.892,30.897 ; TP35.1 R28.1 ; R28.1@16.778,30.897 16.928,31.047 R28.1 ; v1(44.225,41.025) 32.6,41.025 28.52,36.945 18.708,36.945 17.823,36.06 17.823,33.817 16.928,32.922 R28.1
NetR29_1: R29.1 TP36.1 U1.13 U3.5 | length 32.1
  Top Layer w0.4: TP36.1 42.365,31.768 42.365,34.765 46.025,38.425 48.878,38.425 v1(50.09,37.213)
  Bottom Layer w0.4: v1(50.09,37.213) 50.591,37.714 U1.13
  Bottom Layer w0.5: U3.5 40.1,21.96 42.44,24.3 R29.1 ; TP36.1 40.897,30.25 R29.1@42.44,30.25
NetR30_1: R30.1 TP21.1 U2.6 | length 7
  Bottom Layer w0.5: TP21.1 9.55,28.447 11.036,26.961 R30.1 11.036,24.552 11.186,24.402 U2.6
NetR31_1: R31.1 TP22.1 U3.6 | length 7.6
  Bottom Layer w0.5: TP22.1 35.14,27.825 36.29,26.675 R31.1 36.29,23.38 36.44,23.23 U3.6
NetR43_2: R43.2 R45.2 TP26.1 U1.2 U7.5 | length 31.1
  Top Layer w0.5: TP26.1 48.554,55.871 48.554,54.421 57.633,45.342 v2(59.2,45.342)
  Bottom Layer w0.4: v2(59.2,45.342) 59.228,45.314 60.186,45.314 62.275,43.225 62.275,41.914 61.976,41.614 U1.2
  Bottom Layer w0.5: U7.5 44.131,55.906 R45.2 ; R45.2@44.225,55.906 48.703,55.906 TP26.1@48.95,56.153
NetR46_1: R46.1 R50.1 TP29.1 U8.4 | length 8.4
  Bottom Layer w0.5: U8.4 U8.4@22.735,53.32 ; TP29.1@24.45,48.475 22.79,50.135 22.79,51.141 R50.1 22.75,53.305 U8.4@22.735,53.32 ; R46.1 25.094,53.619 24.066,53.619 23.768,53.32 U8.4@22.735,53.32
NetR46_2: R46.2 U7.13 | length 7.6
  Bottom Layer w0.5: R46.2 25.298,55.714 25.39,55.714 25.39,56.408 26.158,57.176 U7.13
NetR47_1: R47.1 R48.1 TP30.1 U8.1 | length 8.3